# Allegro board mib_tongue2_m12.brd
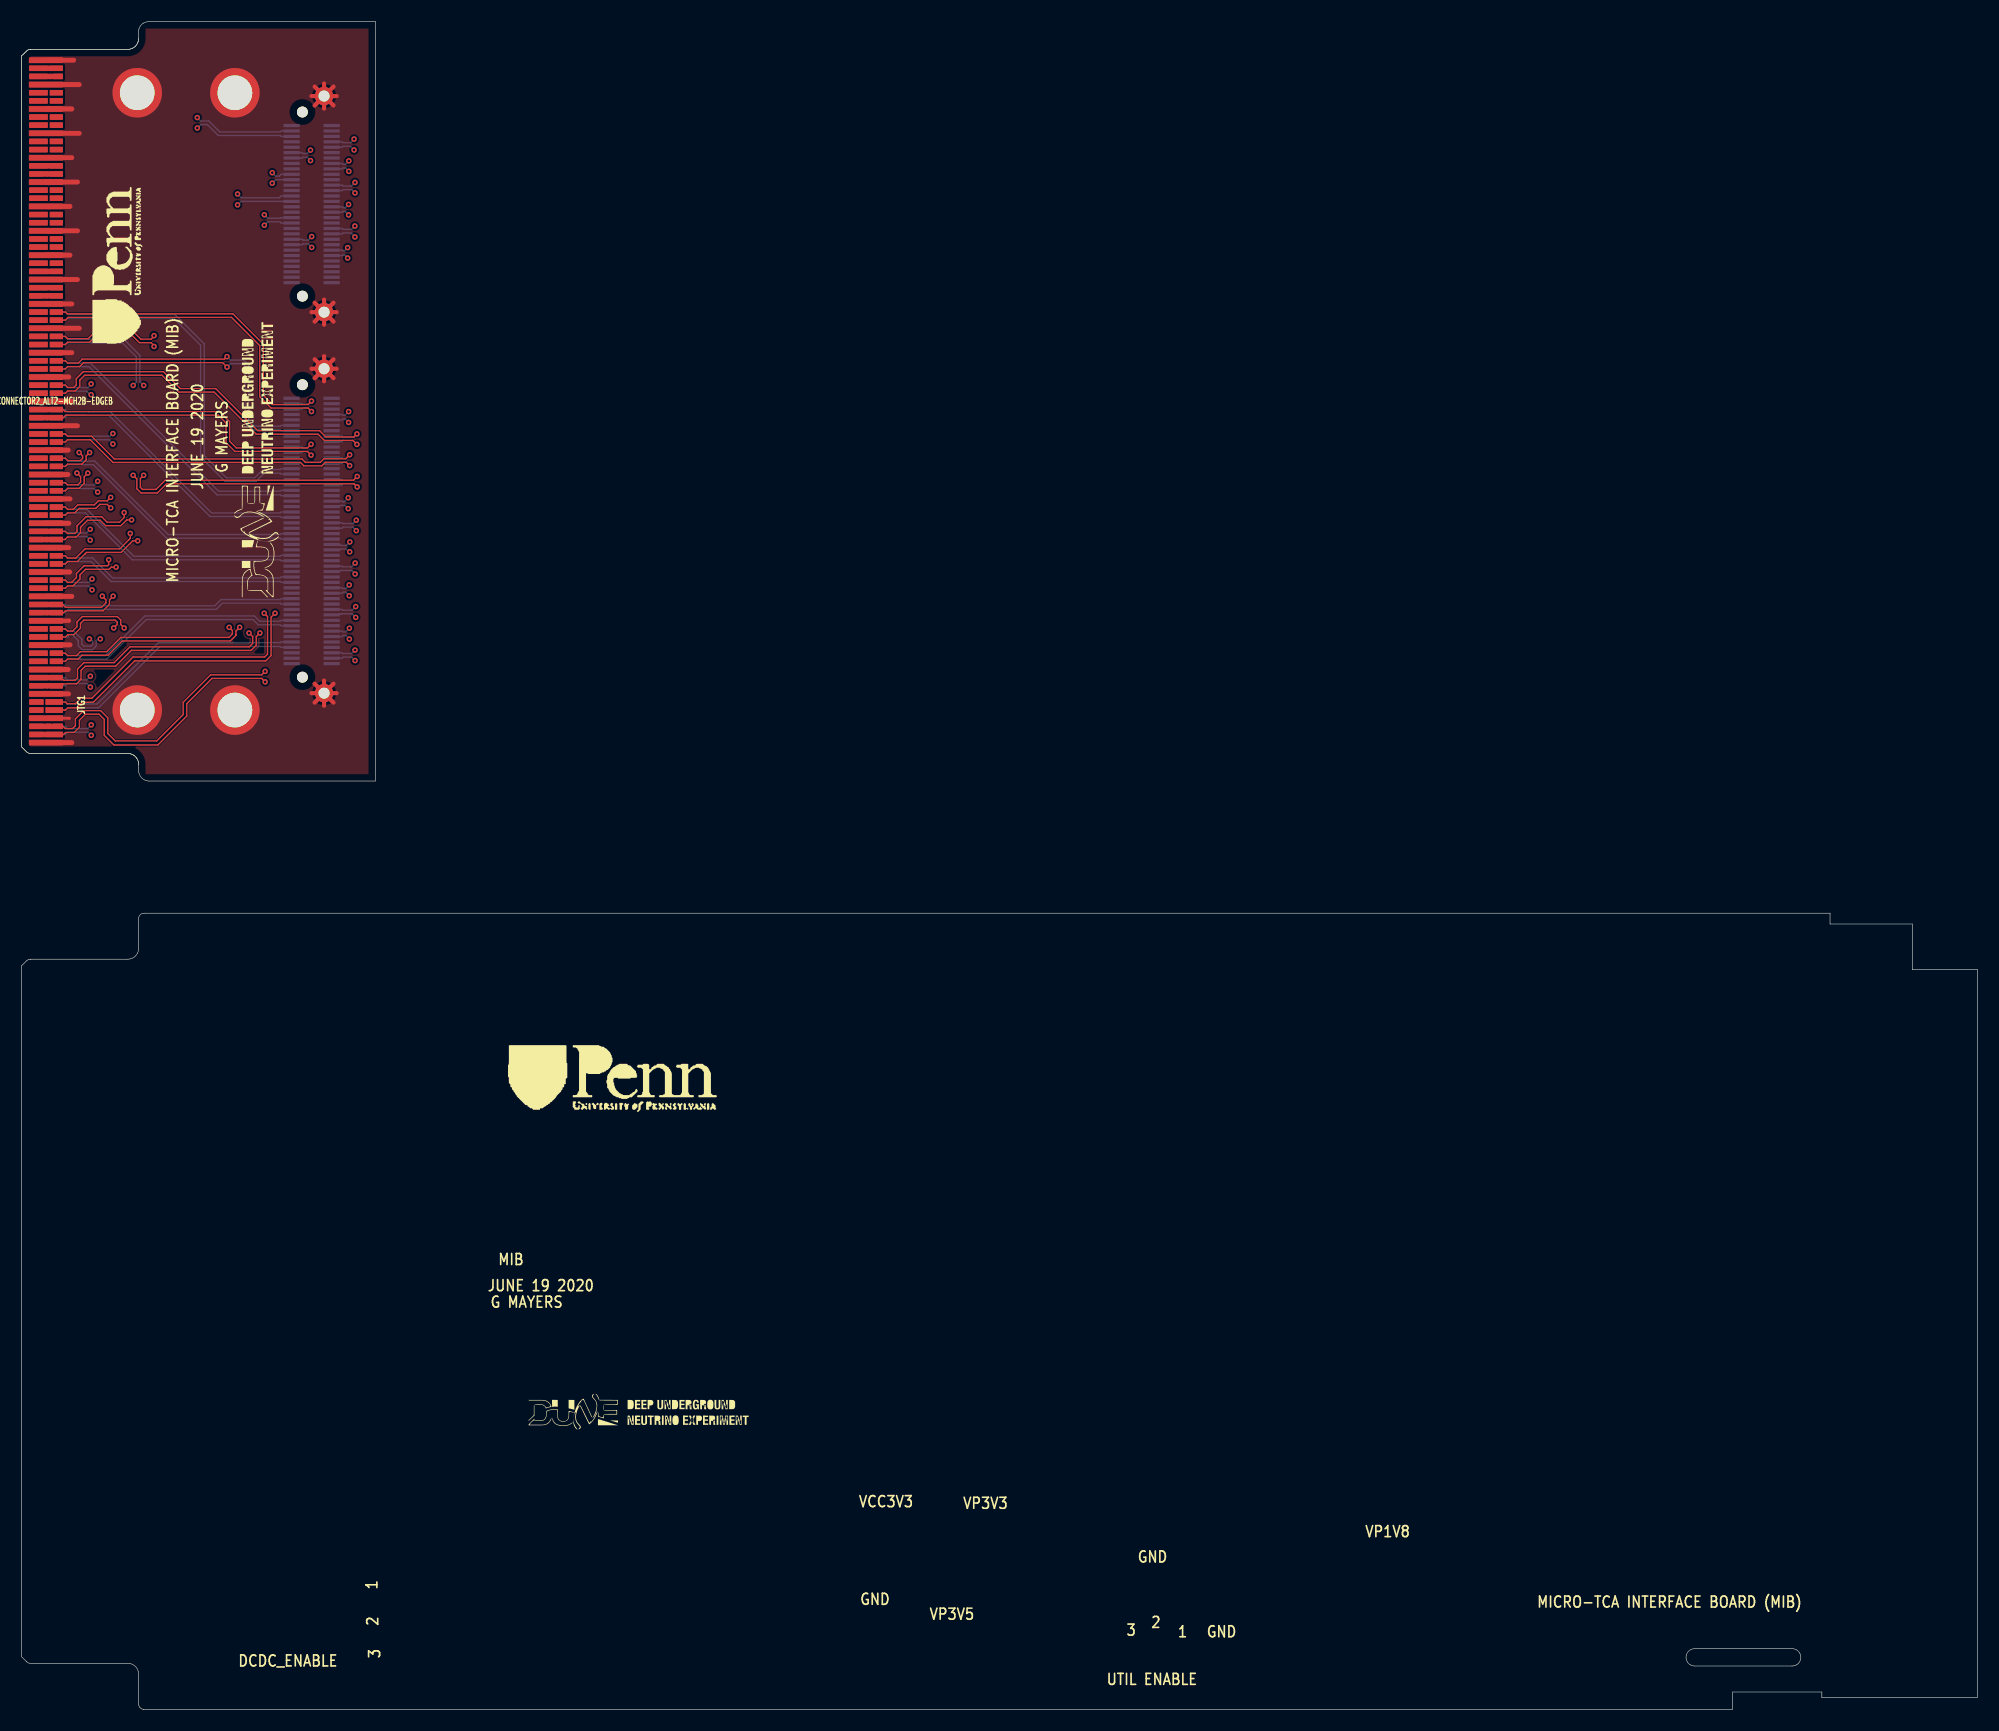
[diagram p0: board, top side]
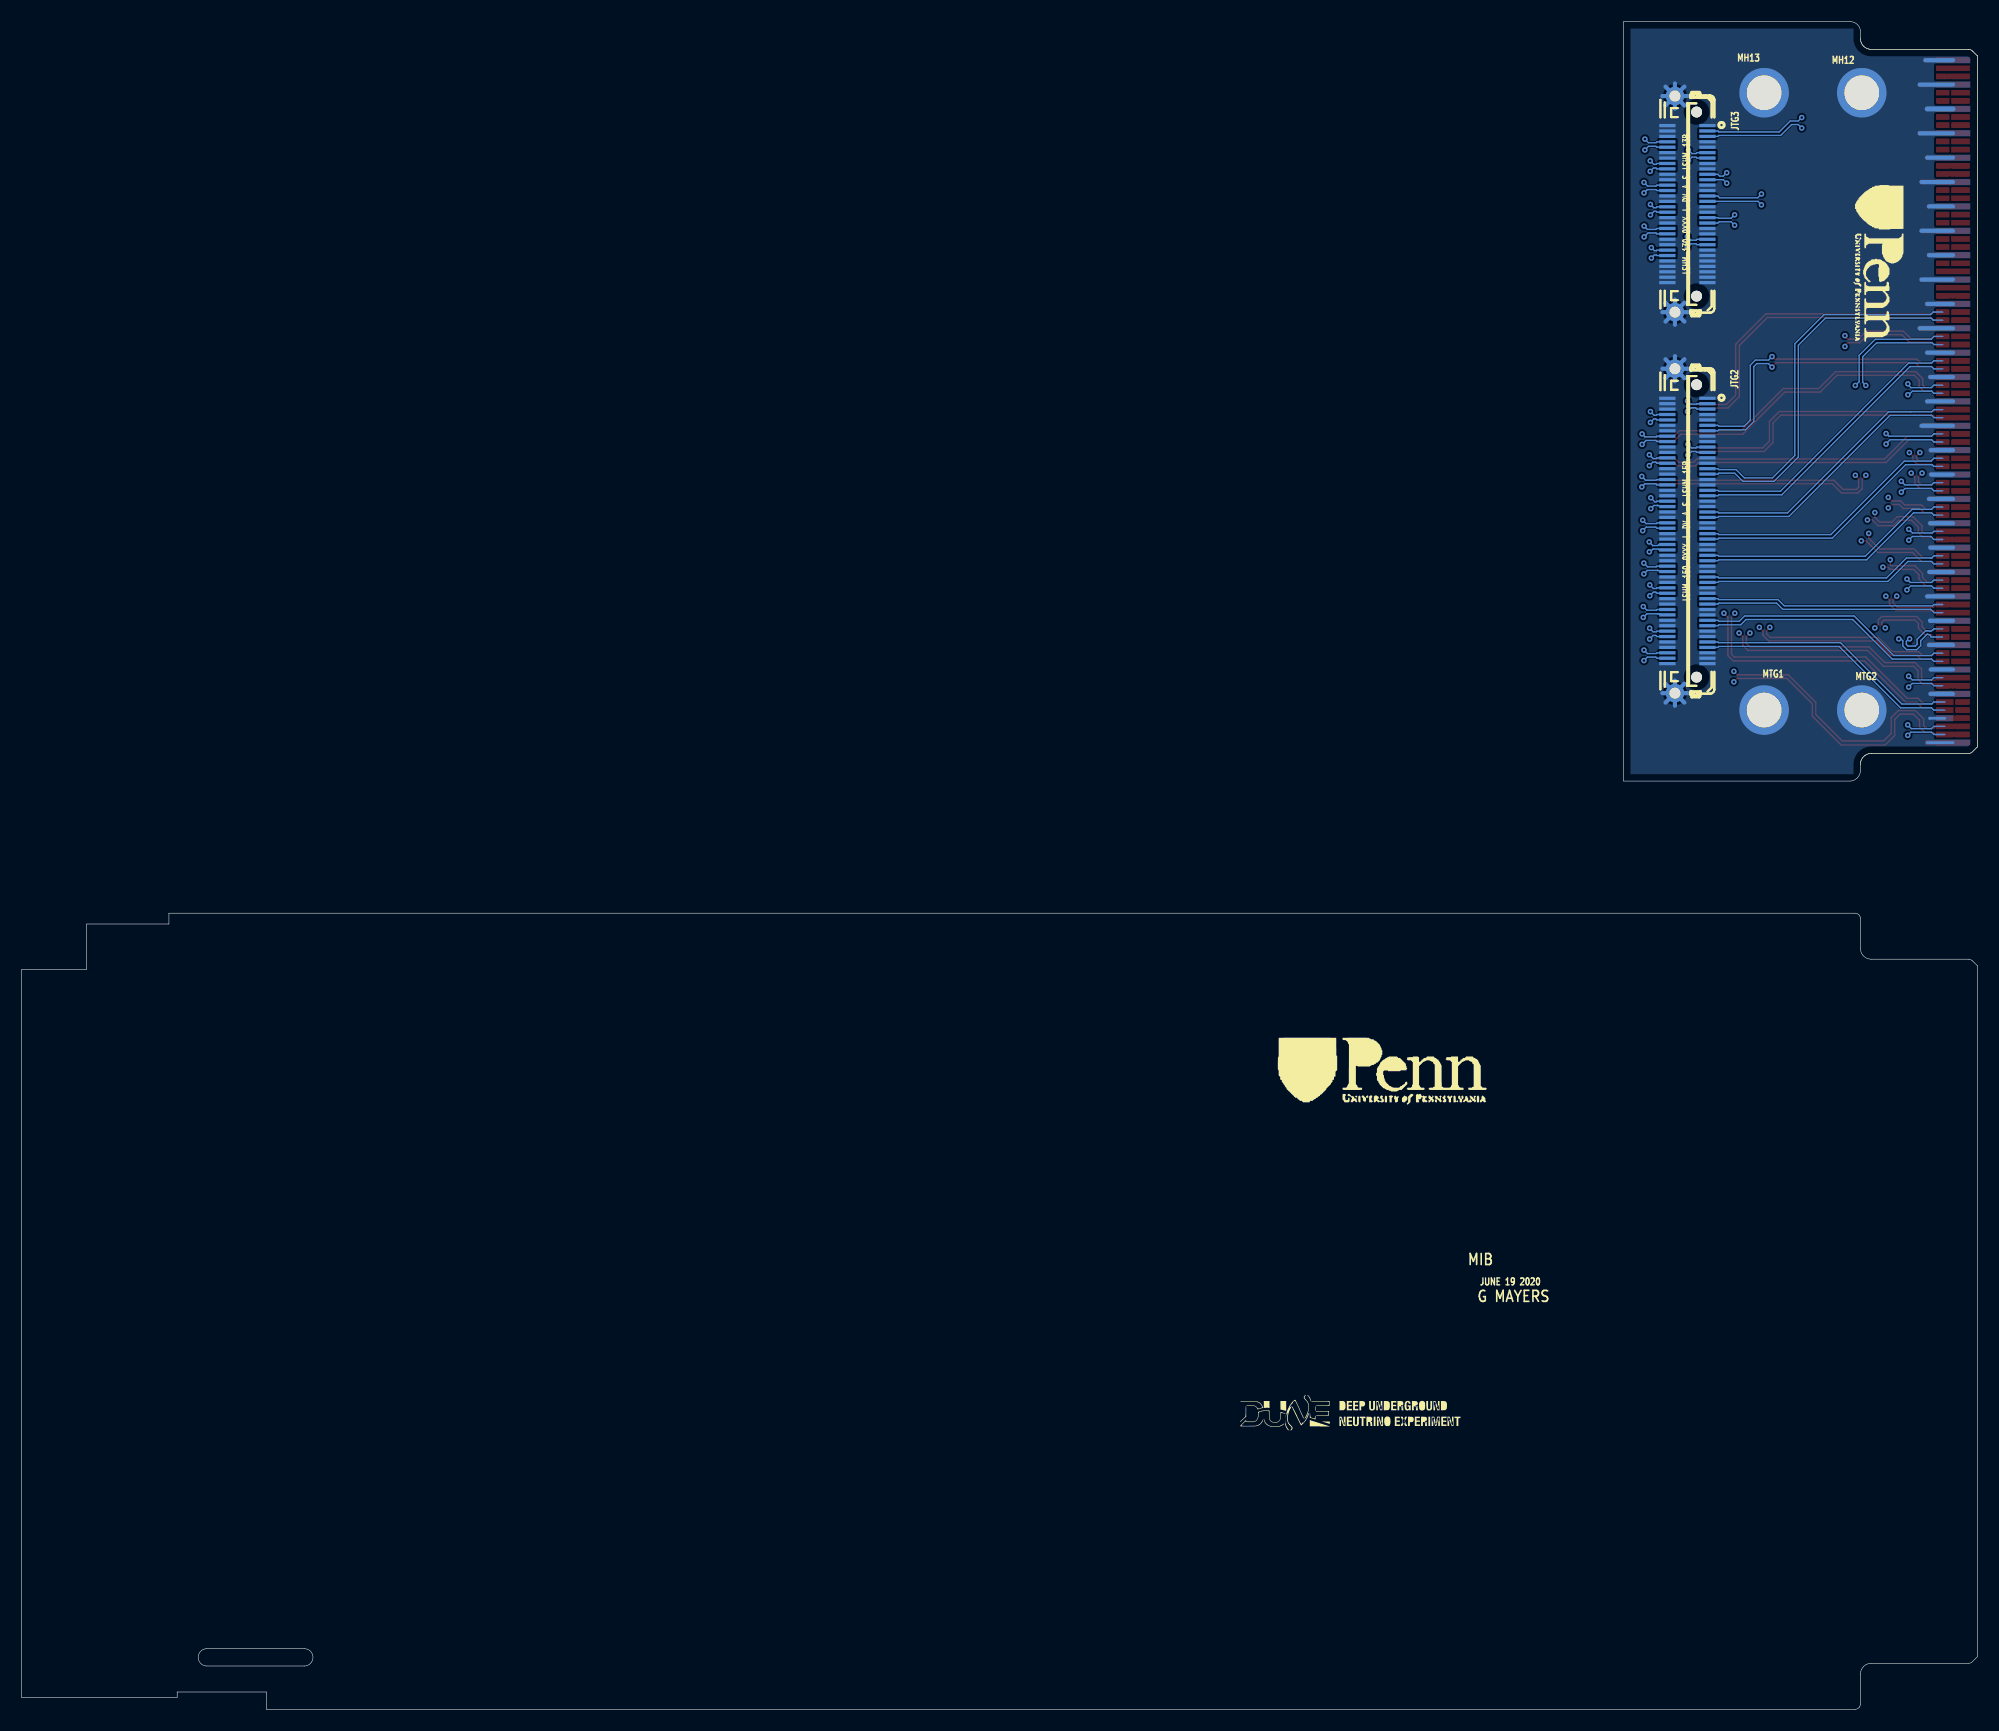
[diagram p1: board, bottom side, seen from below]

Outline 180.6 x 155.81 mm; copper layers: TOP, 02_GND, 03_SIG1, 04_GND, 05_PWR1, 06_GND, 07_SIG2, 08_GND, 09_SIG3, BOTTOM. Coordinates in mm from the lower left corner of the outline.
Outline path: 0,152.65 0.46,153.1 arc(0.62,153.21) 0.8,153.25 0.83,153.25 9.8,153.25 arc(10.51,153.54) 10.8,154.25 10.8,154.99 arc(11.11,155.57) 11.73,155.81 32.67,155.81 32.67,85.7 11.72,85.7 arc(11.06,86.01) 10.8,86.68 10.8,87.25 arc(10.5,87.96) 9.8,88.25 0.8,88.25 arc(0.62,88.28) 0.46,88.39 0,88.85 0,152.65 ; 0,68.65 0.46,69.11 arc(0.62,69.21) 0.8,69.25 0.83,69.25 9.8,69.25 arc(10.51,69.54) 10.8,70.25 10.8,73.01 arc(10.95,73.36) 11.3,73.5 167,73.5 167,72.5 174.6,72.5 174.6,68.3 180.6,68.3 180.6,1.1 166.24,1.1 166.24,1.6 158,1.6 158,0 11.27,0 arc(11.06,0.06) 10.89,0.21 arc(10.82,0.34) 10.8,0.49 10.8,3.26 arc(10.5,3.96) 9.8,4.25 0.8,4.25 arc(0.62,4.29) 0.46,4.39 0,4.85 0,68.65 ; 154.5,4 arc(153.7,4.8) 154.5,5.6 163.5,5.6 arc(164.3,4.8) 163.5,4 154.5,4

## Design rules (mm)
constraint set DEFAULT: min track width 0.127
net group BP.DATA_IN_N: nets BP.DATA_IN_N<0> BP.DATA_IN_N<1> BP.DATA_IN_N<2> BP.DATA_IN_N<3> BP.DATA_IN_N<4> BP.DATA_IN_N<5> BP.DATA_IN_N<6> BP.DATA_IN_N<7> BP.DATA_IN_N<8> BP.DATA_IN_N<9> BP.DATA_IN_N<10> BP.DATA_IN_N<11>
net group BP.DATA_IN_P: nets BP.DATA_IN_P<0> BP.DATA_IN_P<1> BP.DATA_IN_P<2> BP.DATA_IN_P<3> BP.DATA_IN_P<4> BP.DATA_IN_P<5> BP.DATA_IN_P<6> BP.DATA_IN_P<7> BP.DATA_IN_P<8> BP.DATA_IN_P<9> BP.DATA_IN_P<10> BP.DATA_IN_P<11>
net group BP.DATA_OUT_N: nets BP.DATA_OUT_N<0> BP.DATA_OUT_N<1> BP.DATA_OUT_N<2> BP.DATA_OUT_N<3> BP.DATA_OUT_N<4> BP.DATA_OUT_N<5> BP.DATA_OUT_N<6> BP.DATA_OUT_N<7> BP.DATA_OUT_N<8> BP.DATA_OUT_N<9> BP.DATA_OUT_N<10> BP.DATA_OUT_N<11>
net group BP.DATA_OUT_P: nets BP.DATA_OUT_P<0> BP.DATA_OUT_P<1> BP.DATA_OUT_P<2> BP.DATA_OUT_P<3> BP.DATA_OUT_P<4> BP.DATA_OUT_P<5> BP.DATA_OUT_P<6> BP.DATA_OUT_P<7> BP.DATA_OUT_P<8> BP.DATA_OUT_P<9> BP.DATA_OUT_P<10> BP.DATA_OUT_P<11>
net group BP.REF_CLK_N: nets BP.REF_CLK_N<0> BP.REF_CLK_N<1> BP.REF_CLK_N<2> BP.REF_CLK_N<3> BP.REF_CLK_N<4> BP.REF_CLK_N<5> BP.REF_CLK_N<6> BP.REF_CLK_N<7> BP.REF_CLK_N<8> BP.REF_CLK_N<9> BP.REF_CLK_N<10> BP.REF_CLK_N<11>
net group BP.REF_CLK_P: nets BP.REF_CLK_P<0> BP.REF_CLK_P<1> BP.REF_CLK_P<2> BP.REF_CLK_P<3> BP.REF_CLK_P<4> BP.REF_CLK_P<5> BP.REF_CLK_P<6> BP.REF_CLK_P<7> BP.REF_CLK_P<8> BP.REF_CLK_P<9> BP.REF_CLK_P<10> BP.REF_CLK_P<11>

## Placement (name value [footprint] x y rotation side)
JTG1  MCH_TG2-EDGE-170_ALT2  [AMC0_R2_BPLUS_PCB_EDGE]  2.25 120.75 0 top
JTG2  LSHM-150-03.0-L-DV-A-S-K-TR  [SAMTEC_LSHM-150-04-0-L-DV-A-S]  26.83 108.79 90 bottom
JTG3  LSHM-130-03.0-L-DV-A-S-K-TR  [SAMTEC_LSHM-130-04-0-L-DV-A-S]  26.83 138.96 90 bottom
MTG1  MT_HOLE  [MOUNTHOLE]  19.69 92.25 180 bottom
MTG2  MT_HOLE  [MOUNTHOLE]  10.67 92.25 180 bottom
MTG3  MT_HOLE  [MOUNTHOLE]  19.69 149.24 180 bottom
MTG4  MT_HOLE  [MOUNTHOLE]  10.67 149.24 180 bottom
NOREF  -  []  12.04 125.75 90 top
NOREF#2  -  []  0.77 153.25 0 top
NOREF#3  -  []  32.67 85.7 90 top
NOREF#4  -  []  153.74 4.81 0 top
NOREF#5  -  []  161.05 4 90 top
NOREF#6  -  []  0 64.12 0 top
NOREF#7  -  []  157.38 0 90 top
NOREF#8  -  []  5.36 4.25 90 top
NOREF#9  -  []  0.92 4.25 90 top
NOREF#10  -  []  -27.5 124.03 0 top
NOREF#11  -  []  -27.5 136.85 0 top
NOREF#12  -  []  10.8 72.31 0 top
NOREF#13  -  []  23.75 102.67 90 top
NOREF#14  -  []  178.32 68.3 90 top
NOREF#15  -  []  -255.82 -99.62 0 top
NOREF#16  -  []  0 152.61 0 top
NOREF#17  -  []  46.82 25.83 0 top
NOREF#18  -  []  0 39.45 0 top
NOREF#19  -  []  44.48 53.98 0 top
NOREF#20  -  []  -26.64 123.32 0 top
NOREF#21  -  []  15.11 0 90 top
NOREF#22  -  []  153.92 4.25 0 top
NOREF#23  -  []  0.8 88.25 90 top
NOREF#24  -  []  167 73.04 0 top
NOREF#25  -  []  158 0.73 0 top
NOREF#26  -  []  12.32 141.05 270 bottom
NOREF#27  -  []  65.03 54.66 180 bottom
NOREF#28  -  []  68.05 25.73 180 bottom

## Library data of the parts
JTG1 = MCH_CONNECTOR2_ALT2: part number: MCH_CONNECTOR2_ALT2-MCH2B-EDGE-170,MCH_CONNECTOR2_ALT2
JTG2 = LSHM-150-0XXX-L-DV-A-S: part number: LSHM-150-0XXX-L-DV-A-S-LSHM-150-03.0-L-DV-A-S-K-TR,LSHM-150-0XXX-L-DV-A-S
JTG3 = LSHM-130-0XXX-L-DV-A-S: part number: LSHM-130-0XXX-L-DV-A-S-LSHM-130-03.0-L-DV-A-S-K-TR,LSHM-130-0XXX-L-DV-A-S
MTG1-MTG4 = MT_HOLE: part number: MT_HOLE-MT_HOLE,MT_HOLE

## Footprints (pads in the part's own frame, mm; a bottom-side part is the same pattern mirrored in y, then rotated)
AMC0_R2_BPLUS_PCB_EDGE
  rect 1.3x0.5 smd: (-0.888,21) (-0.888,9.75) (-0.888,-1.5) (-0.888,-12.75) (-0.888,-19.5) (-0.888,-26.25) (-0.888,-27.75) (-0.888,-27.75) (-0.888,-28.5) (-0.888,-28.5) (-0.888,-29.25) (-0.888,-30) (-0.888,-30.75)
  rect 1.7x0.5 smd: (-0.7,30.75) (-0.7,30) (-0.7,28.5) (-0.7,28.5) (-0.7,27.75) (-0.7,27.75) (-0.7,26.25) (-0.7,26.25) (-0.7,25.5) (-0.7,25.5) (-0.7,24) (-0.7,24) (-0.7,23.25) (-0.7,23.25) (-0.7,21.75) (-0.7,21) (-0.7,19.5) (-0.7,19.5) (-0.7,18.75) (-0.7,18.75) (-0.7,17.25) (-0.7,17.25) (-0.7,16.5) (-0.7,16.5) (-0.7,15) (-0.7,15) (-0.7,14.25) (-0.7,14.25) (-0.7,12.75) (-0.7,12.75) (-0.7,12) (-0.7,10.5) (-0.7,9.75) (-0.7,8.25) (-0.7,8.25) (-0.7,7.5) (-0.7,7.5) (-0.7,6) (-0.7,6) (-0.7,5.25) (-0.7,5.25) (-0.7,3.75) (-0.7,3.75) (-0.7,3) (-0.7,3) (-0.7,1.5) (-0.7,1.5) (-0.7,0.75) (-0.7,0.75) (-0.7,-0.75) (-0.7,-1.5) (-0.7,-3) (-0.7,-3) (-0.7,-3.75) (-0.7,-3.75) (-0.7,-5.25) (-0.7,-5.25) (-0.7,-6) (-0.7,-6) (-0.7,-7.5) (-0.7,-7.5) (-0.7,-8.25) (-0.7,-8.25) (-0.7,-9.75) (-0.7,-9.75) (-0.7,-10.5) (-0.7,-10.5) (-0.7,-12) (-0.7,-12.75) (-0.7,-14.25) (-0.7,-14.25) (-0.7,-15) (-0.7,-15) (-0.7,-16.5) (-0.7,-16.5) (-0.7,-17.25) (-0.7,-17.25) (-0.7,-18.75) (-0.7,-19.5) (-0.7,-21) (-0.7,-21) (-0.7,-21.75) (-0.7,-21.75) (-0.7,-23.25) (-0.7,-23.25) (-0.7,-24) (-0.7,-24) (-0.7,-25.5) (-0.7,-26.25)
  rect 2x0.5 smd: (-0.55,30) (-0.55,-30)
  rect 3.1x0.5 smd: 1(0,-31.5) 2(0,-30.75) 4(0,-29.25) 7(0,-27) 9(0,-25.5) 10(0,-24.75) 13(0,-22.5) 16(0,-20.25) 18(0,-18.75) 19(0,-18) 22(0,-15.75) 25(0,-13.5) 27(0,-12) 28(0,-11.25) 31(0,-9) 34(0,-6.75) 37(0,-4.5) 40(0,-2.25) 42(0,-0.75) 43(0,0) 46(0,2.25) 49(0,4.5) 52(0,6.75) 55(0,9) 57(0,10.5) 58(0,11.25) 61(0,13.5) 64(0,15.75) 67(0,18) 70(0,20.25) 72(0,21.75) 73(0,22.5) 76(0,24.75) 79(0,27) 82(0,29.25) 84(0,30.75) 85(0,31.5) 86(0,31.5) 89(0,29.25) 92(0,27) 95(0,24.75) 98(0,22.5) 101(0,20.25) 104(0,18) 107(0,15.75) 110(0,13.5) 112(0,12) 113(0,11.25) 116(0,9) 119(0,6.75) 122(0,4.5) 125(0,2.25) 128(0,0) 131(0,-2.25) 134(0,-4.5) 137(0,-6.75) 140(0,-9) 143(0,-11.25) 146(0,-13.5) 149(0,-15.75) 152(0,-18) 155(0,-20.25) 158(0,-22.5) 161(0,-24.75) 164(0,-27) 170(0,-31.5)
  rect 0.9x0.5 smd: 3(1.1,-30) 83(1.1,30)
  rect 1.6x0.5 smd: 5(0.762,-28.5) 6(0.762,-27.75) 8(0.762,-26.25) 17(0.762,-19.5) 26(0.762,-12.75) 41(0.762,-1.5) 56(0.762,9.75) 71(0.762,21) 165(0.762,-27.75) 166(0.762,-28.5) 167(0.762,-29.25) 168(0.762,-30) 169(0.762,-30.75)
  rect 1.2x0.5 smd: 11(0.95,-24) 12(0.95,-23.25) 14(0.95,-21.75) 15(0.95,-21) 20(0.95,-17.25) 21(0.95,-16.5) 23(0.95,-15) 24(0.95,-14.25) 29(0.95,-10.5) 30(0.95,-9.75) 32(0.95,-8.25) 33(0.95,-7.5) 35(0.95,-6) 36(0.95,-5.25) 38(0.95,-3.75) 39(0.95,-3) 44(0.95,0.75) 45(0.95,1.5) 47(0.95,3) 48(0.95,3.75) 50(0.95,5.25) 51(0.95,6) 53(0.95,7.5) 54(0.95,8.25) 59(0.95,12) 60(0.95,12.75) 62(0.95,14.25) 63(0.95,15) 65(0.95,16.5) 66(0.95,17.25) 68(0.95,18.75) 69(0.95,19.5) 74(0.95,23.25) 75(0.95,24) 77(0.95,25.5) 78(0.95,26.25) 80(0.95,27.75) 81(0.95,28.5) 87(0.95,30.75) 88(0.95,30) 90(0.95,28.5) 91(0.95,27.75) 93(0.95,26.25) 94(0.95,25.5) 96(0.95,24) 97(0.95,23.25) 99(0.95,21.75) 100(0.95,21) 102(0.95,19.5) 103(0.95,18.75) 105(0.95,17.25) 106(0.95,16.5) 108(0.95,15) 109(0.95,14.25) 111(0.95,12.75) 114(0.95,10.5) 115(0.95,9.75) 117(0.95,8.25) 118(0.95,7.5) 120(0.95,6) 121(0.95,5.25) 123(0.95,3.75) 124(0.95,3) 126(0.95,1.5) 127(0.95,0.75) 129(0.95,-0.75) 130(0.95,-1.5) 132(0.95,-3) 133(0.95,-3.75) 135(0.95,-5.25) 136(0.95,-6) 138(0.95,-7.5) 139(0.95,-8.25) 141(0.95,-9.75) 142(0.95,-10.5) 144(0.95,-12) 145(0.95,-12.75) 147(0.95,-14.25) 148(0.95,-15) 150(0.95,-16.5) 151(0.95,-17.25) 153(0.95,-18.75) 154(0.95,-19.5) 156(0.95,-21) 157(0.95,-21.75) 159(0.95,-23.25) 160(0.95,-24) 162(0.95,-25.5) 163(0.95,-26.25)
MOUNTHOLE
  round 4.572 hole 3.2: 1(0,0)
SAMTEC_LSHM-130-04-0-L-DV-A-S
  round 1 hole 1.45 unplated: (-8.5,-0.9) (8.5,-0.9)
  rect 0.3x1.5 smd: 1(7.25,-1.9) 2(7.25,1.8) 3(6.75,-1.9) 4(6.75,1.8) 5(6.25,-1.9) 6(6.25,1.8) 7(5.75,-1.9) 8(5.75,1.8) 9(5.25,-1.9) 10(5.25,1.8) 11(4.75,-1.9) 12(4.75,1.8) 13(4.25,-1.9) 14(4.25,1.8) 15(3.75,-1.9) 16(3.75,1.8) 17(3.25,-1.9) 18(3.25,1.8) 19(2.75,-1.9) 20(2.75,1.8) 21(2.25,-1.9) 22(2.25,1.8) 23(1.75,-1.9) 24(1.75,1.8) 25(1.25,-1.9) 26(1.25,1.8) 27(0.75,-1.9) 28(0.75,1.8) 29(0.25,-1.9) 30(0.25,1.8) 31(-0.25,-1.9) 32(-0.25,1.8) 33(-0.75,-1.9) 34(-0.75,1.8) 35(-1.25,-1.9) 36(-1.25,1.8) 37(-1.75,-1.9) 38(-1.75,1.8) 39(-2.25,-1.9) 40(-2.25,1.8) 41(-2.75,-1.9) 42(-2.75,1.8) 43(-3.25,-1.9) 44(-3.25,1.8) 45(-3.75,-1.9) 46(-3.75,1.8) 47(-4.25,-1.9) 48(-4.25,1.8) 49(-4.75,-1.9) 50(-4.75,1.8) 51(-5.25,-1.9) 52(-5.25,1.8) 53(-5.75,-1.9) 54(-5.75,1.8) 55(-6.25,-1.9) 56(-6.25,1.8) 57(-6.75,-1.9) 58(-6.75,1.8) 59(-7.25,-1.9) 60(-7.25,1.8)
  round 1.702 hole 1.016: 61(-9.975,1.1) 62(9.975,1.1)
SAMTEC_LSHM-150-04-0-L-DV-A-S
  round 1 hole 1.45 unplated: (-13.5,-0.9) (13.5,-0.9)
  rect 0.3x1.5 smd: 1(12.25,-1.9) 2(12.25,1.8) 3(11.75,-1.9) 4(11.75,1.8) 5(11.25,-1.9) 6(11.25,1.8) 7(10.75,-1.9) 8(10.75,1.8) 9(10.25,-1.9) 10(10.25,1.8) 11(9.75,-1.9) 12(9.75,1.8) 13(9.25,-1.9) 14(9.25,1.8) 15(8.75,-1.9) 16(8.75,1.8) 17(8.25,-1.9) 18(8.25,1.8) 19(7.75,-1.9) 20(7.75,1.8) 21(7.25,-1.9) 22(7.25,1.8) 23(6.75,-1.9) 24(6.75,1.8) 25(6.25,-1.9) 26(6.25,1.8) 27(5.75,-1.9) 28(5.75,1.8) 29(5.25,-1.9) 30(5.25,1.8) 31(4.75,-1.9) 32(4.75,1.8) 33(4.25,-1.9) 34(4.25,1.8) 35(3.75,-1.9) 36(3.75,1.8) 37(3.25,-1.9) 38(3.25,1.8) 39(2.75,-1.9) 40(2.75,1.8) 41(2.25,-1.9) 42(2.25,1.8) 43(1.75,-1.9) 44(1.75,1.8) 45(1.25,-1.9) 46(1.25,1.8) 47(0.75,-1.9) 48(0.75,1.8) 49(0.25,-1.9) 50(0.25,1.8) 51(-0.25,-1.9) 52(-0.25,1.8) 53(-0.75,-1.9) 54(-0.75,1.8) 55(-1.25,-1.9) 56(-1.25,1.8) 57(-1.75,-1.9) 58(-1.75,1.8) 59(-2.25,-1.9) 60(-2.25,1.8) 61(-2.75,-1.9) 62(-2.75,1.8) 63(-3.25,-1.9) 64(-3.25,1.8) 65(-3.75,-1.9) 66(-3.75,1.8) 67(-4.25,-1.9) 68(-4.25,1.8) 69(-4.75,-1.9) 70(-4.75,1.8) 71(-5.25,-1.9) 72(-5.25,1.8) 73(-5.75,-1.9) 74(-5.75,1.8) 75(-6.25,-1.9) 76(-6.25,1.8) 77(-6.75,-1.9) 78(-6.75,1.8) 79(-7.25,-1.9) 80(-7.25,1.8) 81(-7.75,-1.9) 82(-7.75,1.8) 83(-8.25,-1.9) 84(-8.25,1.8) 85(-8.75,-1.9) 86(-8.75,1.8) 87(-9.25,-1.9) 88(-9.25,1.8) 89(-9.75,-1.9) 90(-9.75,1.8) 91(-10.25,-1.9) 92(-10.25,1.8) 93(-10.75,-1.9) 94(-10.75,1.8) 95(-11.25,-1.9) 96(-11.25,1.8) 97(-11.75,-1.9) 98(-11.75,1.8) 99(-12.25,-1.9) 100(-12.25,1.8)
  round 1.702 hole 1.016: 101(-14.975,1.1) 102(14.975,1.1)

## Nets
GND: JTG1.1 JTG1.4 JTG1.7 JTG1.10 JTG1.13 JTG1.16 JTG1.19 JTG1.22 JTG1.25 JTG1.28 JTG1.31 JTG1.34 JTG1.37 JTG1.40 JTG1.43 JTG1.46 JTG1.49 JTG1.52 JTG1.55 JTG1.58 JTG1.61 JTG1.64 JTG1.67 JTG1.70 JTG1.73 JTG1.76 JTG1.79 JTG1.82 JTG1.85 JTG1.86 JTG1.89 JTG1.92 JTG1.95 JTG1.98 JTG1.101 JTG1.104 JTG1.107 JTG1.110 JTG1.113 JTG1.116 JTG1.119 JTG1.122 JTG1.125 JTG1.128 JTG1.131 JTG1.134 JTG1.137 JTG1.140 JTG1.143 JTG1.146 JTG1.149 JTG1.152 JTG1.155 JTG1.158 JTG1.161 JTG1.164 JTG1.167 JTG1.170 JTG2.1 JTG2.2 JTG2.4 JTG2.6 JTG2.7 JTG2.9 JTG2.12 JTG2.14 JTG2.15 JTG2.17 JTG2.20 JTG2.22 JTG2.23 JTG2.25 JTG2.28 JTG2.30 JTG2.31 JTG2.33 JTG2.36 JTG2.38 JTG2.39 JTG2.41 JTG2.44 JTG2.46 JTG2.47 JTG2.49 JTG2.52 JTG2.54 JTG2.55 JTG2.57 JTG2.60 JTG2.62 JTG2.63 JTG2.65 JTG2.68 JTG2.70 JTG2.71 JTG2.73 JTG2.76 JTG2.78 JTG2.79 JTG2.81 JTG2.84 JTG2.86 JTG2.87 JTG2.89 JTG2.92 JTG2.94 JTG2.95 JTG2.97 JTG2.99 JTG2.100 JTG2.101 JTG2.102(F2) JTG3.1 JTG3.2 JTG3.4 JTG3.6 JTG3.7 JTG3.9 JTG3.12 JTG3.14 JTG3.15 JTG3.17 JTG3.20 JTG3.22 JTG3.23 JTG3.25 JTG3.28 JTG3.30 JTG3.31 JTG3.33 JTG3.36 JTG3.38 JTG3.39 JTG3.41 JTG3.44 JTG3.46 JTG3.47 JTG3.49 JTG3.51 JTG3.52 JTG3.53 JTG3.54 JTG3.55 JTG3.56 JTG3.57 JTG3.58 JTG3.59 JTG3.60 JTG3.61 JTG3.62(F2) MTG1.1(MH_SIG) MTG2.1(MH_SIG) MTG3.1(MH_SIG) MTG4.1(MH_SIG)
BP.DATA_IN_N<0>: JTG1.53 JTG2.5
BP.DATA_IN_N<1>: JTG1.50 JTG2.10
BP.DATA_IN_N<2>: JTG1.47 JTG2.13
BP.DATA_IN_N<3>: JTG1.44 JTG2.18
BP.DATA_IN_N<4>: JTG1.41 JTG2.21
BP.DATA_IN_N<5>: JTG1.38 JTG2.26
BP.DATA_IN_N<6>: JTG1.118 JTG2.29
BP.DATA_IN_N<7>: JTG1.121 JTG2.34
BP.DATA_IN_N<8>: JTG1.124 JTG2.37
BP.DATA_IN_N<9>: JTG1.127 JTG2.42
BP.DATA_IN_N<10>: JTG1.130 JTG2.45
BP.DATA_IN_N<11>: JTG1.133 JTG2.50
BP.DATA_IN_P<0>: JTG1.54 JTG2.3
BP.DATA_IN_P<1>: JTG1.51 JTG2.8
BP.DATA_IN_P<2>: JTG1.48 JTG2.11
BP.DATA_IN_P<3>: JTG1.45 JTG2.16
BP.DATA_IN_P<4>: JTG1.42 JTG2.19
BP.DATA_IN_P<5>: JTG1.39 JTG2.24
BP.DATA_IN_P<6>: JTG1.117 JTG2.27
BP.DATA_IN_P<7>: JTG1.120 JTG2.32
BP.DATA_IN_P<8>: JTG1.123 JTG2.35
BP.DATA_IN_P<9>: JTG1.126 JTG2.40
BP.DATA_IN_P<10>: JTG1.129 JTG2.43
BP.DATA_IN_P<11>: JTG1.132 JTG2.48
BP.DATA_OUT_N<0>: JTG1.136 JTG2.53
BP.DATA_OUT_N<1>: JTG1.139 JTG2.58
BP.DATA_OUT_N<2>: JTG1.142 JTG2.61
BP.DATA_OUT_N<3>: JTG1.145 JTG2.66
BP.DATA_OUT_N<4>: JTG1.148 JTG2.69
BP.DATA_OUT_N<5>: JTG1.151 JTG2.74
BP.DATA_OUT_N<6>: JTG1.154 JTG2.77
BP.DATA_OUT_N<7>: JTG1.157 JTG2.82
BP.DATA_OUT_N<8>: JTG1.160 JTG2.85
BP.DATA_OUT_N<9>: JTG1.163 JTG2.90
BP.DATA_OUT_N<10>: JTG1.166 JTG2.93
BP.DATA_OUT_N<11>: JTG1.169 JTG2.98
BP.DATA_OUT_P<0>: JTG1.135 JTG2.51
BP.DATA_OUT_P<1>: JTG1.138 JTG2.56
BP.DATA_OUT_P<2>: JTG1.141 JTG2.59
BP.DATA_OUT_P<3>: JTG1.144 JTG2.64
BP.DATA_OUT_P<4>: JTG1.147 JTG2.67
BP.DATA_OUT_P<5>: JTG1.150 JTG2.72
BP.DATA_OUT_P<6>: JTG1.153 JTG2.75
BP.DATA_OUT_P<7>: JTG1.156 JTG2.80
BP.DATA_OUT_P<8>: JTG1.159 JTG2.83
BP.DATA_OUT_P<9>: JTG1.162 JTG2.88
BP.DATA_OUT_P<10>: JTG1.165 JTG2.91
BP.DATA_OUT_P<11>: JTG1.168 JTG2.96
BP.REF_CLK_N<0>: JTG1.35 JTG3.5
BP.REF_CLK_N<1>: JTG1.32 JTG3.10
BP.REF_CLK_N<2>: JTG1.29 JTG3.13
BP.REF_CLK_N<3>: JTG1.26 JTG3.18
BP.REF_CLK_N<4>: JTG1.23 JTG3.21
BP.REF_CLK_N<5>: JTG1.20 JTG3.26
BP.REF_CLK_N<6>: JTG1.17 JTG3.29
BP.REF_CLK_N<7>: JTG1.14 JTG3.34
BP.REF_CLK_N<8>: JTG1.11 JTG3.37
BP.REF_CLK_N<9>: JTG1.8 JTG3.42
BP.REF_CLK_N<10>: JTG1.5 JTG3.45
BP.REF_CLK_N<11>: JTG1.2 JTG3.50
BP.REF_CLK_P<0>: JTG1.36 JTG3.3
BP.REF_CLK_P<1>: JTG1.33 JTG3.8
BP.REF_CLK_P<2>: JTG1.30 JTG3.11
BP.REF_CLK_P<3>: JTG1.27 JTG3.16
BP.REF_CLK_P<4>: JTG1.24 JTG3.19
BP.REF_CLK_P<5>: JTG1.21 JTG3.24
BP.REF_CLK_P<6>: JTG1.18 JTG3.27
BP.REF_CLK_P<7>: JTG1.15 JTG3.32
BP.REF_CLK_P<8>: JTG1.12 JTG3.35
BP.REF_CLK_P<9>: JTG1.9(TXFUB-) JTG3.40
BP.REF_CLK_P<10>: JTG1.6 JTG3.43
BP.REF_CLK_P<11>: JTG1.3 JTG3.48

Pads without a net: JTG1 56 57 59 60 62 63 65 66 68 69 71 72 74 75 77 78 80 81 83 84 87 88 90 91 93 94 96 97 99 100 102 103 105 106 108 109 111 112 114 115

## Via types
v1: diameter 0.508, hole 0.254, TOP to BOTTOM, 100 vias

## Routing (per net, layer and track width the routed paths; a pad name or vN(x,y) marks a point on that pad's centre or on a via; arc(x,y) is an arc through that point)
GND: length 443.9
  TOP w0.254: 4.4,91.48 4.38,91.5 JTG1.4
  TOP w0.381: 27.06,94.68 JTG2.101 ; JTG2.101 27.93,94.97 ; JTG2.101 28.79,94.68 ; JTG2.101 26.77,93.81 ; JTG2.101 27.06,92.94 ; JTG2.101 29.08,93.81 ; JTG2.101 28.79,92.94 ; JTG2.101 27.93,92.66 ; JTG3.62 27.93,150.09 ; JTG3.62 27.93,147.78 ; JTG3.62 27.06,148.07 ; JTG3.62 28.79,149.81 ; JTG3.62 28.79,148.07 ; JTG3.62 29.08,148.94 ; JTG3.62 27.06,149.81 ; JTG3.62 26.77,148.94 ; 27.06,122.89 JTG2.102 ; JTG2.102 26.77,123.76 ; JTG2.102 27.93,124.92 ; JTG2.102 27.93,122.61 ; JTG2.102 28.79,122.89 ; JTG2.102 28.79,124.63 ; JTG2.102 29.08,123.76 ; JTG2.102 27.06,124.63 ; JTG1.16 4.35,100.5 4.36,100.51 ; JTG3.61 29.08,128.99 ; JTG3.61 26.77,128.99 ; JTG3.61 27.06,128.12 ; JTG3.61 27.93,130.14 ; JTG3.61 28.79,128.12 ; JTG3.61 27.06,129.86 ; JTG3.61 27.93,127.83 ; JTG3.61 28.79,129.86
  TOP w0.457: 4.63,125.25 JTG1.49 ; 4.27,114 JTG1.34 ; JTG1.13 3.7,98.25 3.73,98.27 4.46,98.27 ; 5.15,141 JTG1.70 ; 4.3,96 JTG1.10 ; 4.35,109.5 JTG1.28 ; 4.63,102.75 JTG1.19 ; 5.31,145.5 JTG1.76 ; 5.15,118.5 JTG1.40 ; 4.34,107.25 JTG1.25 ; 4.63,143.25 JTG1.73 ; 4.35,123 JTG1.46 ; 5.15,132 JTG1.58 ; 4.46,138.75 JTG1.67 ; 4.63,89.25 JTG1.1 ; 4.63,147.75 JTG1.79 ; 4.63,120.75 JTG1.43 ; 4.43,105 JTG1.22 ; 4.46,111.75 JTG1.31 ; 5.31,150 JTG1.82 ; 4.79,152.25 JTG1.85 ; 5.15,136.5 JTG1.64 ; 4.46,134.25 JTG1.61 ; 4.63,129.75 JTG1.55 ; 4.33,93.75 JTG1.7 ; 5.31,127.5 JTG1.52 ; 4.29,116.25 JTG1.37
  02_GND w0.381: JTG3.62 29.08,148.94 ; JTG3.62 27.06,148.07 ; JTG3.62 27.93,150.09 ; JTG3.62 27.06,149.81 ; JTG3.62 26.77,148.94 ; JTG3.62 28.79,148.07 ; JTG3.62 28.79,149.81 ; JTG3.62 27.93,147.78 ; JTG2.102 29.08,123.76 ; JTG2.102 28.79,124.63 ; JTG2.102 27.93,124.92 ; JTG2.102 28.79,122.89 ; JTG2.102 26.77,123.76 ; JTG2.102 27.06,122.89 ; JTG2.102 27.93,122.61 ; JTG2.102 27.06,124.63 ; 26.77,128.99 JTG3.61 ; JTG3.61 27.06,128.12 ; JTG3.61 27.93,130.14 ; JTG3.61 28.79,128.12 ; JTG3.61 28.79,129.86 ; JTG3.61 29.08,128.99 ; JTG3.61 27.93,127.83 ; JTG3.61 27.06,129.86 ; 26.77,93.81 JTG2.101 ; JTG2.101 27.06,94.68 ; JTG2.101 27.93,94.97 ; JTG2.101 27.06,92.94 ; JTG2.101 27.93,92.66 ; JTG2.101 29.08,93.81 ; JTG2.101 28.79,94.68 ; JTG2.101 28.79,92.94
  04_GND w0.381: JTG2.102 28.79,124.63 ; JTG2.102 27.06,122.89 ; JTG2.102 27.93,122.61 ; JTG2.102 26.77,123.76 ; JTG2.102 27.93,124.92 ; JTG2.102 28.79,122.89 ; JTG2.102 27.06,124.63 ; JTG2.102 29.08,123.76 ; JTG3.61 28.79,128.12 ; JTG3.61 27.93,130.14 ; JTG3.61 27.06,128.12 ; JTG3.61 29.08,128.99 ; JTG3.61 27.93,127.83 ; JTG3.61 27.06,129.86 ; JTG3.61 28.79,129.86 ; JTG3.61 26.77,128.99 ; JTG2.101 27.93,94.97 ; JTG2.101 26.77,93.81 ; JTG2.101 29.08,93.81 ; JTG2.101 27.93,92.66 ; JTG2.101 28.79,94.68 ; JTG2.101 28.79,92.94 ; JTG2.101 27.06,94.68 ; JTG2.101 27.06,92.94 ; 27.93,147.78 JTG3.62 ; JTG3.62 28.79,148.07 ; JTG3.62 28.79,149.81 ; JTG3.62 27.06,148.07 ; JTG3.62 27.93,150.09 ; JTG3.62 27.06,149.81 ; JTG3.62 26.77,148.94 ; JTG3.62 29.08,148.94
  05_PWR1 w0.381: JTG2.102 29.08,123.76 ; JTG2.102 27.93,124.92 ; JTG2.102 26.77,123.76 ; JTG2.102 27.06,124.63 ; JTG2.102 28.79,122.89 ; JTG2.102 27.93,122.61 ; JTG2.102 28.79,124.63 ; JTG2.102 27.06,122.89 ; 27.06,92.94 JTG2.101 ; JTG2.101 28.79,92.94 ; JTG2.101 29.08,93.81 ; JTG2.101 27.06,94.68 ; JTG2.101 27.93,92.66 ; JTG2.101 28.79,94.68 ; JTG2.101 27.93,94.97 ; JTG2.101 26.77,93.81 ; JTG3.62 28.79,148.07 ; JTG3.62 27.06,149.81 ; JTG3.62 27.93,150.09 ; JTG3.62 29.08,148.94 ; JTG3.62 27.93,147.78 ; JTG3.62 27.06,148.07 ; JTG3.62 28.79,149.81 ; JTG3.62 26.77,148.94 ; JTG3.61 27.93,130.14 ; JTG3.61 26.77,128.99 ; JTG3.61 28.79,128.12 ; JTG3.61 29.08,128.99 ; JTG3.61 28.79,129.86 ; JTG3.61 27.06,128.12 ; JTG3.61 27.06,129.86 ; JTG3.61 27.93,127.83
  06_GND w0.381: JTG3.61 29.08,128.99 ; JTG3.61 28.79,129.86 ; JTG3.61 27.06,129.86 ; JTG3.61 26.77,128.99 ; JTG3.61 27.93,130.14 ; JTG3.61 27.93,127.83 ; JTG3.61 27.06,128.12 ; JTG3.61 28.79,128.12 ; JTG2.101 28.79,92.94 ; JTG2.101 27.06,94.68 ; JTG2.101 27.93,94.97 ; JTG2.101 27.93,92.66 ; JTG2.101 26.77,93.81 ; JTG2.101 29.08,93.81 ; JTG2.101 28.79,94.68 ; JTG2.101 27.06,92.94 ; 27.93,122.61 JTG2.102 ; JTG2.102 29.08,123.76 ; JTG2.102 27.06,122.89 ; JTG2.102 28.79,122.89 ; JTG2.102 27.93,124.92 ; JTG2.102 26.77,123.76 ; JTG2.102 28.79,124.63 ; JTG2.102 27.06,124.63 ; JTG3.62 29.08,148.94 ; JTG3.62 27.93,147.78 ; JTG3.62 28.79,149.81 ; JTG3.62 27.06,148.07 ; JTG3.62 27.93,150.09 ; JTG3.62 26.77,148.94 ; JTG3.62 28.79,148.07 ; JTG3.62 27.06,149.81
  08_GND w0.381: 27.93,122.61 JTG2.102 ; JTG2.102 29.08,123.76 ; JTG2.102 27.93,124.92 ; JTG2.102 28.79,124.63 ; JTG2.102 27.06,124.63 ; JTG2.102 27.06,122.89 ; JTG2.102 26.77,123.76 ; JTG2.102 28.79,122.89 ; 27.06,129.86 JTG3.61 ; JTG3.61 28.79,128.12 ; JTG3.61 29.08,128.99 ; JTG3.61 28.79,129.86 ; JTG3.61 26.77,128.99 ; JTG3.61 27.93,127.83 ; JTG3.61 27.06,128.12 ; JTG3.61 27.93,130.14 ; JTG3.62 28.79,149.81 ; JTG3.62 29.08,148.94 ; JTG3.62 27.93,147.78 ; JTG3.62 28.79,148.07 ; JTG3.62 27.93,150.09 ; JTG3.62 26.77,148.94 ; JTG3.62 27.06,148.07 ; JTG3.62 27.06,149.81 ; JTG2.101 28.79,92.94 ; JTG2.101 26.77,93.81 ; JTG2.101 27.06,94.68 ; JTG2.101 28.79,94.68 ; JTG2.101 27.93,94.97 ; JTG2.101 27.93,92.66 ; JTG2.101 29.08,93.81 ; JTG2.101 27.06,92.94
  09_SIG3 w0.381: JTG3.61 29.08,128.99 ; JTG3.61 27.06,129.86 ; JTG3.61 26.77,128.99 ; JTG3.61 27.06,128.12 ; JTG3.61 27.93,127.83 ; JTG3.61 28.79,129.86 ; JTG3.61 27.93,130.14 ; JTG3.61 28.79,128.12 ; JTG3.62 27.93,150.09 ; JTG3.62 28.79,149.81 ; JTG3.62 28.79,148.07 ; JTG3.62 29.08,148.94 ; JTG3.62 27.06,148.07 ; JTG3.62 27.93,147.78 ; JTG3.62 26.77,148.94 ; JTG3.62 27.06,149.81 ; JTG2.101 28.79,94.68 ; JTG2.101 29.08,93.81 ; JTG2.101 26.77,93.81 ; JTG2.101 27.93,92.66 ; JTG2.101 28.79,92.94 ; JTG2.101 27.06,92.94 ; JTG2.101 27.06,94.68 ; JTG2.101 27.93,94.97 ; JTG2.102 29.08,123.76 ; JTG2.102 27.06,124.63 ; JTG2.102 27.93,122.61 ; JTG2.102 27.06,122.89 ; JTG2.102 28.79,122.89 ; JTG2.102 27.93,124.92 ; JTG2.102 28.79,124.63 ; JTG2.102 26.77,123.76
  BOTTOM w0.254: JTG1.167 4.38,91.5 4.4,91.48 ; JTG1.1 4.63,89.25
  BOTTOM w0.381: 4.34,107.25 JTG1.25 ; 5.31,150 JTG1.82 ; 27.93,92.66 JTG2.101 ; JTG2.101 29.08,93.81 ; JTG2.101 27.93,94.97 ; JTG2.101 28.79,92.94 ; JTG2.101 27.06,94.68 ; JTG2.101 26.77,93.81 ; JTG2.101 28.79,94.68 ; JTG2.101 27.06,92.94 ; 4.46,98.27 2.28,98.27 JTG1.13 ; 27.06,149.81 JTG3.62 ; JTG3.62 28.79,149.81 ; JTG3.62 27.06,148.07 ; JTG3.62 29.08,148.94 ; JTG3.62 27.93,150.09 ; JTG3.62 27.93,147.78 ; JTG3.62 26.77,148.94 ; JTG3.62 28.79,148.07 ; 4.63,102.75 JTG1.19 ; 27.06,122.89 JTG2.102 ; JTG2.102 28.79,122.89 ; JTG2.102 28.79,124.63 ; JTG2.102 29.08,123.76 ; JTG2.102 26.77,123.76 ; JTG2.102 27.93,124.92 ; JTG2.102 27.06,124.63 ; JTG2.102 27.93,122.61 ; 5.15,136.5 JTG1.64 ; 27.06,128.12 JTG3.61 ; JTG3.61 27.06,129.86 ; JTG3.61 29.08,128.99 ; JTG3.61 28.79,128.12 ; JTG3.61 27.93,130.14 ; JTG3.61 26.77,128.99 ; JTG3.61 28.79,129.86 ; JTG3.61 27.93,127.83 ; JTG1.16 4.35,100.5 4.36,100.51 ; 4.46,111.75 JTG1.31 ; 4.63,143.25 JTG1.73 ; 5.15,132 JTG1.58 ; 4.46,134.25 JTG1.61 ; 4.35,109.5 JTG1.28 ; 4.63,120.75 JTG1.43 ; 4.27,114 JTG1.34 ; 4.3,96 JTG1.10 ; 4.79,152.25 JTG1.85 ; 4.63,125.25 JTG1.49 ; 5.15,141 JTG1.70 ; 4.63,129.75 JTG1.55 ; 4.33,93.75 JTG1.7 ; 5.31,145.5 JTG1.76 ; 5.31,127.5 JTG1.52 ; 4.29,116.25 JTG1.37 ; 5.15,118.5 JTG1.40 ; 4.35,123 JTG1.46 ; 4.46,138.75 JTG1.67 ; 4.43,105 JTG1.22
  BOTTOM w0.457: 4.63,147.75 JTG1.79
BP.DATA_IN_N<0>: length 32.1
  TOP w0.127: JTG1.53 4.04,128.25 4.3,128.5 19.38,128.5 21.98,125.9 21.98,121.18 23.03,120.13 26.45,120.13 v1(26.76,119.81)
  BOTTOM w0.127: v1(26.76,119.81) 26.42,120.16 26.01,120.16 25.89,120.04 JTG2.5
BP.DATA_IN_N<1>: length 33.4
  TOP w0.127: v1(12.23,125.82) 12.23,125.89 11.96,126.17 10.87,126.17 10.13,126.91 6.97,126.91 6.27,126.21 4.25,126.21 4.04,126 JTG1.50
  03_SIG1 w0.127: v1(12.23,125.82) 12.57,126.15 14.57,126.15 22.28,118.44 28.01,118.44 28.71,119.14 29.86,119.14 v1(30.19,118.81)
  BOTTOM w0.127: v1(30.19,118.81) 29.87,119.13 29.69,119.13 29.59,119.04 JTG2.10
BP.DATA_IN_N<2>: length 27.8
  TOP w0.127: JTG1.47 4.04,123.75 4.25,123.96 5.36,123.96 5.72,124.32 18.55,124.32 v1(18.96,123.92)
  BOTTOM w0.127: v1(18.96,123.92) 19.28,124.23 20.36,124.23 20.64,123.95 20.64,118.89 21.4,118.12 23.88,118.12 23.96,118.04 JTG2.13
BP.DATA_IN_N<3>: length 34
  TOP w0.127: JTG1.44 4.04,121.5 4.25,121.71 4.95,121.71 5.37,122.13 5.37,122.71 5.82,123.16 12.96,123.16 14.52,121.61 17.78,121.61 21.67,117.72 27.38,117.72 27.95,117.14 30.59,117.14 v1(30.96,116.78)
  BOTTOM w0.127: v1(30.96,116.78) 30.59,117.14 29.7,117.14 29.59,117.04 JTG2.18
BP.DATA_IN_N<4>: length 28.4
  TOP w0.127: JTG1.41 3.84,119.25 4.08,119.48 18.14,119.48 18.88,118.75 18.88,116.94 19.69,116.13 26.39,116.13 v1(26.73,115.79)
  BOTTOM w0.127: v1(26.73,115.79) 26.39,116.12 25.98,116.12 25.89,116.04 JTG2.21
BP.DATA_IN_N<5>: length 30.3
  TOP w0.127: v1(30.29,114.82) 29.99,115.12 28.05,115.12 27.72,114.8 26.06,114.8 25.75,115.11 8.43,115.11 6.33,117.21 4.25,117.21 4.04,117 JTG1.38
  BOTTOM w0.127: v1(30.29,114.82) 29.97,115.14 29.7,115.14 29.59,115.04 JTG2.26
BP.DATA_IN_N<6>: length 34.4
  BOTTOM w0.127: JTG1.118 4.07,128.25 4.26,128.44 14.02,128.44 16.53,125.93 16.53,115.61 18.78,113.36 21.65,113.36 22.41,114.12 23.88,114.12 23.96,114.04 JTG2.29
BP.DATA_IN_N<7>: length 44.2
  TOP w0.127: v1(10.3,113.93) 10.63,113.59 10.63,112.69 11.02,112.3 12.54,112.3 13.39,113.14 30.7,113.14 v1(30.99,112.85)
  07_SIG2 w0.127: v1(10.3,113.93) 10.64,114.27 10.64,121.88 v1(10.3,122.22)
  BOTTOM w0.127: v1(10.3,122.22) 10.59,122.51 10.59,124.86 9.3,126.15 4.17,126.15 4.01,126 JTG1.121 ; JTG2.34 29.59,113.04 29.7,113.14 30.7,113.14 v1(30.99,112.85)
BP.DATA_IN_N<8>: length 26.8
  BOTTOM w0.127: JTG2.37 23.96,112.04 23.88,112.12 18.05,112.12 6.21,123.96 4.23,123.96 4.02,123.75 JTG1.124
BP.DATA_IN_N<9>: length 33.5
  03_SIG1 w0.127: v1(30.16,110.85) 29.87,111.14 18.6,111.14 8.04,121.7 6.75,121.7 v1(6.42,121.36)
  BOTTOM w0.127: JTG2.42 29.23,111.04 29.31,111.12 29.49,111.12 29.51,111.15 29.52,111.15 29.52,111.14 29.87,111.14 v1(30.16,110.85) ; JTG1.127 4.02,121.5 4.21,121.69 5.99,121.69 6.32,121.36 v1(6.42,121.36)
BP.DATA_IN_N<10>: length 25.7
  BOTTOM w0.127: JTG2.45 23.96,110.04 23.88,110.12 17.4,110.12 8.06,119.45 5.83,119.45 5.83,119.46 4.23,119.46 4.02,119.25 JTG1.130
BP.DATA_IN_N<11>: length 34
  03_SIG1 w0.127: v1(30.9,108.82) 30.57,109.14 18.09,109.14 10.14,117.09 8.71,117.09 v1(8.43,116.81)
  BOTTOM w0.127: v1(30.9,108.82) 30.58,109.14 29.7,109.14 29.59,109.04 JTG2.50 ; v1(8.43,116.81) 8.43,116.84 8.06,117.21 4.23,117.21 4.02,117 JTG1.133
BP.DATA_IN_P<0>: length 32
  TOP w0.127: v1(26.76,120.78) 26.45,120.46 23.17,120.46 22.31,121.32 22.31,126.03 19.51,128.83 4.21,128.83 4.04,129 JTG1.54
  BOTTOM w0.127: v1(26.76,120.78) 26.47,120.49 25.94,120.49 25.89,120.54 JTG2.3
BP.DATA_IN_P<1>: length 33.3
  TOP w0.127: v1(12.23,126.82) 12.23,126.77 11.96,126.5 11.01,126.5 10.27,127.24 6.83,127.24 6.13,126.54 4.25,126.54 4.04,126.75 JTG1.51
  03_SIG1 w0.127: v1(12.23,126.82) 12.57,126.48 14.7,126.48 22.42,118.77 27.87,118.77 28.57,119.47 29.86,119.47 v1(30.19,119.81)
  BOTTOM w0.127: JTG2.8 29.59,119.54 29.67,119.46 29.85,119.46 v1(30.19,119.81)
BP.DATA_IN_P<2>: length 27.7
  TOP w0.127: JTG1.48 4.04,124.5 4.25,124.29 5.22,124.29 5.59,124.65 18.74,124.65 v1(18.96,124.88)
  BOTTOM w0.127: JTG2.11 23.96,118.54 23.88,118.45 21.54,118.45 20.97,119.02 20.97,124.09 20.5,124.56 19.28,124.56 v1(18.96,124.88)
BP.DATA_IN_P<3>: length 33.9
  TOP w0.127: JTG1.45 4.04,122.25 4.25,122.04 4.81,122.04 5.04,122.27 5.04,122.85 5.69,123.49 13.09,123.49 13.37,123.22 13.37,123.22 14.65,121.94 17.92,121.94 21.8,118.05 27.51,118.05 28.09,117.47 30.69,117.47 v1(30.96,117.74)
  BOTTOM w0.127: v1(30.96,117.74) 30.69,117.47 29.66,117.47 29.59,117.54 JTG2.16
BP.DATA_IN_P<4>: length 29.1
  TOP w0.127: v1(26.73,116.79) 26.39,116.46 19.82,116.46 19.21,117.07 19.21,118.89 18.28,119.81 4.01,119.81 3.82,120 JTG1.42
  BOTTOM w0.127: JTG2.19 25.89,116.54 25.98,116.45 26.39,116.45 v1(26.73,116.79)
BP.DATA_IN_P<5>: length 30.3
  TOP w0.127: JTG1.39 4.04,117.75 4.25,117.54 6.47,117.54 8.57,115.44 25.89,115.44 26.2,115.13 27.58,115.13 27.91,115.45 29.92,115.45 v1(30.29,115.82)
  BOTTOM w0.127: JTG2.24 29.59,115.54 29.66,115.47 29.94,115.47 v1(30.29,115.82)
BP.DATA_IN_P<6>: length 34.5
  BOTTOM w0.127: JTG2.27 23.96,114.54 23.88,114.45 22.27,114.45 21.51,113.69 18.92,113.69 16.86,115.75 16.86,126.06 14.16,128.77 4.32,128.77 4.09,129 JTG1.117
BP.DATA_IN_P<7>: length 44.3
  TOP w0.127: v1(30.99,113.82) 30.64,113.47 13.25,113.47 12.4,112.63 11.16,112.63 10.96,112.82 10.96,113.63 v1(11.26,113.93)
  07_SIG2 w0.127: v1(11.27,122.22) 10.97,121.93 10.97,114.22 v1(11.26,113.93)
  BOTTOM w0.127: JTG2.32 29.59,113.54 29.66,113.47 30.64,113.47 v1(30.99,113.82) ; v1(11.27,122.22) 10.92,122.58 10.92,125 9.43,126.48 4.26,126.48 4,126.75 JTG1.120
BP.DATA_IN_P<8>: length 26.8
  BOTTOM w0.127: JTG1.123 4.02,124.5 4.23,124.29 6.35,124.29 18.18,112.45 23.88,112.45 23.96,112.54 JTG2.35
BP.DATA_IN_P<9>: length 33.6
  03_SIG1 w0.127: v1(6.42,122.37) 6.75,122.03 8.18,122.03 18.73,111.47 29.78,111.47 v1(30.16,111.85)
  BOTTOM w0.127: v1(6.42,122.37) 6.42,122.3 6.13,122.02 6.13,122.02 4.24,122.02 4.02,122.25 JTG1.126 ; JTG2.40 29.59,111.54 29.66,111.47 29.78,111.47 v1(30.16,111.85)
BP.DATA_IN_P<10>: length 25.7
  BOTTOM w0.127: JTG1.129 4.02,120 4.23,119.79 6.16,119.79 6.17,119.79 8.2,119.79 17.53,110.45 23.88,110.45 23.96,110.54 JTG2.43
BP.DATA_IN_P<11>: length 33.9
  03_SIG1 w0.127: v1(8.43,117.78) 8.43,117.65 8.61,117.47 10.32,117.47 18.27,109.52 30.64,109.52 v1(30.9,109.78)
  BOTTOM w0.127: JTG1.132 4.02,117.75 4.23,117.54 8.19,117.54 v1(8.43,117.78) ; JTG2.48 29.57,109.54 29.63,109.47 30.59,109.47 v1(30.9,109.78)
BP.DATA_OUT_N<0>: length 24.6
  BOTTOM w0.127: JTG2.53 23.96,108.04 23.88,108.12 13.39,108.12 6.61,114.91 4.17,114.91 4.02,114.75 JTG1.136
BP.DATA_OUT_N<1>: length 31.7
  03_SIG1 w0.127: v1(30.29,106.86) 30.22,106.86 29.94,107.13 14.08,107.13 8.51,112.71 7.36,112.71 v1(7.02,112.37)
  BOTTOM w0.127: JTG1.139 4.02,112.5 4.23,112.71 6.68,112.71 v1(7.02,112.37) ; JTG2.58 29.37,107.04 29.44,107.11 29.96,107.11 30.22,106.86 v1(30.29,106.86)
BP.DATA_OUT_N<2>: length 23.6
  BOTTOM w0.127: JTG1.142 4.02,110.25 4.23,110.46 5.88,110.46 10.22,106.12 23.88,106.12 23.96,106.04 JTG2.61
BP.DATA_OUT_N<3>: length 32.3
  03_SIG1 w0.127: v1(6.33,107.94) 6.67,108.28 7.93,108.28 11.39,104.81 20.95,104.81 21.6,105.46 27.28,105.46 27.55,105.19 30.42,105.19 v1(30.8,104.82)
  BOTTOM w0.127: v1(30.8,104.82) 30.47,105.14 29.52,105.14 29.52,105.15 29.51,105.15 29.49,105.12 29.31,105.12 29.23,105.04 JTG2.66 ; JTG1.145 4.02,108 4.29,108.28 6,108.28 v1(6.33,107.94)
BP.DATA_OUT_N<4>: length 22.6
  BOTTOM w0.127: JTG1.148 4.02,105.75 4.23,105.96 4.36,105.97 6.41,105.97 8.25,104.12 23.88,104.12 23.96,104.04 JTG2.69
BP.DATA_OUT_N<5>: length 29.6
  03_SIG1 w0.127: v1(30.25,102.81) 29.87,103.18 24.02,103.18 23.52,103.68 6.84,103.68 v1(6.5,103.35)
  BOTTOM w0.127: JTG2.74 29.59,103.04 29.7,103.14 29.91,103.14 v1(30.25,102.81) ; v1(6.5,103.35) 6.5,103.36 6.15,103.71 4.23,103.71 4.02,103.5 JTG1.151
BP.DATA_OUT_N<6>: length 22.1
  BOTTOM w0.127: JTG2.77 23.96,102.04 23.88,102.12 18.54,102.12 17.97,101.55 4.32,101.55 4.02,101.25 JTG1.154
BP.DATA_OUT_N<7>: length 34.9
  03_SIG1 w0.127: v1(7.26,98.82) 6.92,99.16 6.92,100.33 8.12,101.53 20.94,101.53 21.43,102.03 27.44,102.03 28.33,101.13 30.52,101.13 v1(30.85,100.81)
  BOTTOM w0.127: v1(30.85,100.81) 30.51,101.14 29.52,101.14 29.52,101.15 29.51,101.15 29.49,101.12 29.31,101.12 29.23,101.04 JTG2.82 ; JTG1.157 4.27,99 4.4,99.2 4.61,99.25 4.64,99.25 5.23,98.66 5.23,98.19 5.59,97.83 6.54,97.83 6.89,98.17 6.89,98.65 7.06,98.82 v1(7.26,98.82)
BP.DATA_OUT_N<8>: length 23.6
  BOTTOM w0.127: JTG1.160 4.02,96.75 4.23,96.96 7.86,96.96 11.51,100.61 21.36,100.61 21.84,100.12 23.88,100.12 23.96,100.04 JTG2.85
BP.DATA_OUT_N<9>: length 31.2
  03_SIG1 w0.127: v1(6.35,94.37) 6.68,94.71 9.57,94.71 12.36,97.51 24.47,97.51 26.13,99.16 29.91,99.16 v1(30.26,98.81)
  BOTTOM w0.127: JTG1.163 4.02,94.5 4.23,94.71 6.01,94.71 v1(6.35,94.37) ; JTG2.90 29.59,99.04 29.7,99.14 29.93,99.14 v1(30.26,98.81)
BP.DATA_OUT_N<10>: length 24.4
  BOTTOM w0.127: JTG2.93 23.96,98.04 23.88,98.12 12.76,98.12 7.09,92.46 4.24,92.46 4.03,92.25 JTG1.166
BP.DATA_OUT_N<11>: length 36.4
  03_SIG1 w0.127: v1(30.79,96.82) 30.5,97.1 25.76,97.1 24.36,95.71 24.36,91.9 21.75,89.28 9.33,89.28 8.46,90.14 6.65,90.14 v1(6.43,89.92)
  BOTTOM w0.127: v1(6.43,89.92) 6.14,90.21 4.24,90.21 4.03,90 JTG1.169 ; JTG2.98 29.59,97.04 29.7,97.14 30.47,97.14 v1(30.79,96.82)
BP.DATA_OUT_P<0>: length 24.7
  BOTTOM w0.127: JTG1.135 4.02,115.5 4.28,115.24 6.75,115.24 13.53,108.45 23.88,108.45 23.96,108.54 JTG2.51
BP.DATA_OUT_P<1>: length 31.7
  03_SIG1 w0.127: v1(7.02,113.37) 7.36,113.04 8.65,113.04 14.17,107.51 30.04,107.51 v1(30.3,107.78)
  BOTTOM w0.127: JTG1.138 4.02,113.25 4.23,113.04 6.68,113.04 v1(7.02,113.37) ; JTG2.56 29.4,107.54 29.5,107.44 29.96,107.44 29.97,107.44 v1(30.3,107.78)
BP.DATA_OUT_P<2>: length 23.6
  BOTTOM w0.127: JTG1.141 4.02,111 4.23,110.79 6.02,110.79 10.35,106.45 23.88,106.45 23.96,106.54 JTG2.59
BP.DATA_OUT_P<3>: length 32.2
  03_SIG1 w0.127: v1(6.33,108.94) 6.67,108.61 8.06,108.61 11.53,105.14 20.82,105.14 21.46,105.79 27.42,105.79 27.68,105.52 30.5,105.52 v1(30.8,105.82)
  BOTTOM w0.127: JTG1.144 4.02,108.75 4.16,108.61 6,108.61 v1(6.33,108.94) ; JTG2.64 29.59,105.54 29.66,105.47 30.44,105.47 v1(30.8,105.82)
BP.DATA_OUT_P<4>: length 22.6
  BOTTOM w0.127: JTG1.147 4.02,106.5 4.22,106.29 4.35,106.3 6.55,106.3 8.39,104.45 23.88,104.45 23.96,104.54 JTG2.67
BP.DATA_OUT_P<5>: length 29.5
  03_SIG1 w0.127: v1(6.5,104.35) 6.84,104.01 23.66,104.01 24.15,103.51 29.95,103.51 v1(30.25,103.81)
  BOTTOM w0.127: v1(6.5,104.35) 6.19,104.04 4.23,104.04 4.02,104.25 JTG1.150 ; JTG2.72 29.59,103.54 29.66,103.47 29.91,103.47 v1(30.25,103.81)
BP.DATA_OUT_P<6>: length 22
  BOTTOM w0.127: JTG2.75 23.96,102.54 23.88,102.45 18.4,102.45 17.83,101.88 4.14,101.88 4.02,102 JTG1.153
BP.DATA_OUT_P<7>: length 34.8
  03_SIG1 w0.127: v1(6.26,98.82) 6.59,99.16 6.59,100.47 7.99,101.86 20.8,101.86 21.3,102.36 27.57,102.36 28.47,101.46 30.5,101.46 v1(30.85,101.81)
  BOTTOM w0.127: v1(6.26,98.82) 6.34,98.82 6.55,98.6 6.55,98.31 6.4,98.16 5.73,98.16 5.56,98.33 5.56,98.79 4.78,99.58 4.57,99.58 4.32,99.52 4.12,99.64 4.02,99.75 JTG1.156 ; JTG2.80 29.59,101.54 29.66,101.47 30.51,101.47 v1(30.85,101.81)
BP.DATA_OUT_P<8>: length 23.6
  BOTTOM w0.127: JTG1.159 4.02,97.5 4.23,97.29 7.72,97.29 11.37,100.94 21.49,100.94 21.98,100.45 23.88,100.45 23.96,100.54 JTG2.83
BP.DATA_OUT_P<9>: length 31.2
  03_SIG1 w0.127: v1(30.26,99.81) 29.95,99.49 25.99,99.49 24.33,97.84 12.23,97.84 9.43,95.04 6.68,95.04 v1(6.35,95.37)
  BOTTOM w0.127: JTG1.162 4.02,95.25 4.23,95.04 6.01,95.04 v1(6.35,95.37) ; JTG2.88 29.59,99.54 29.66,99.47 29.93,99.47 v1(30.26,99.81)
BP.DATA_OUT_P<10>: length 24.4
  BOTTOM w0.127: JTG1.165 4.03,93 4.21,92.81 6.96,92.81 12.63,98.48 23.9,98.48 23.96,98.54 JTG2.91
BP.DATA_OUT_P<11>: length 36.5
  03_SIG1 w0.127: v1(6.43,90.89) 6.84,90.47 8.6,90.47 9.46,89.61 21.61,89.61 24.03,92.03 24.03,95.84 25.62,97.43 30.43,97.43 v1(30.79,97.79)
  BOTTOM w0.127: JTG1.168 4.03,90.75 4.24,90.54 6.09,90.54 6.43,90.87 v1(6.43,90.89) ; JTG2.96 29.59,97.54 29.66,97.47 30.47,97.47 v1(30.79,97.79)
BP.REF_CLK_N<0>: length 49.3
  TOP w0.127: JTG1.35 4.04,114.75 4.25,114.96 5.57,114.96 5.96,115.35 5.96,115.71 v1(6.27,116.03)
  07_SIG2 w0.127: v1(16.22,145.99) 15.9,146.3 13.8,146.3 8.03,140.54 8.03,119.26 5.96,117.19 5.96,116.34 v1(6.27,116.03)
  BOTTOM w0.127: JTG3.5 23.96,145.21 23.88,145.3 18.16,145.3 17.15,146.3 16.54,146.3 v1(16.22,145.99)
BP.REF_CLK_N<1>: length 59
  TOP w0.127: v1(6.11,114.13) 5.77,113.79 5.77,113.17 5.32,112.72 4.26,112.72 4.04,112.5 JTG1.32
  07_SIG2 w0.127: v1(30.7,143.96) 30.7,144.13 30.52,144.31 28.21,144.31 27.9,144.62 14.33,144.62 9.37,139.66 9.37,121.54 9.78,121.13 9.78,116.06 8.48,114.77 5.89,114.77 5.77,114.65 5.77,114.47 v1(6.11,114.13)
  BOTTOM w0.127: JTG3.10 29.59,144.21 29.68,144.3 30.36,144.3 v1(30.7,143.96)
BP.REF_CLK_N<2>: length 56.6
  TOP w0.127: JTG1.29 4.04,110.25 4.25,110.46 4.91,110.46 5.32,110.87 6.85,110.87 7.22,111.24 7.9,111.24 v1(8.22,110.92)
  07_SIG2 w0.127: v1(8.22,110.92) 8.54,111.24 9.28,111.24 10.11,112.07 12.76,112.07 13.67,112.98 13.67,141.76 15.47,143.57 24.58,143.57 24.85,143.3 26.36,143.3 v1(26.68,142.98)
  BOTTOM w0.127: JTG3.13 25.89,143.21 25.98,143.3 26.36,143.3 v1(26.68,142.98)
BP.REF_CLK_N<3>: length 62.2
  TOP w0.127: JTG1.26 4.01,108 4.24,108.22 5.05,108.22 5.44,108.62 5.44,109.12 6.09,109.77 7.25,109.77 7.75,109.27 9.17,109.27 9.7,109.8 v1(10.15,109.8)
  07_SIG2 w0.127: v1(10.15,109.8) 10.15,110.25 10.81,110.91 14.57,110.91 14.85,111.19 14.85,140.71 16.77,142.63 24.17,142.63 24.98,141.82 27.53,141.82 28,142.3 29.9,142.3 v1(30.21,141.99)
  BOTTOM w0.127: JTG3.18 29.59,142.21 29.68,142.3 29.9,142.3 v1(30.21,141.99)
BP.REF_CLK_N<4>: length 54.6
  TOP w0.127: JTG1.23 4.04,105.75 4.25,105.96 5.14,105.96 5.86,106.68 5.99,106.8 9.19,106.8 10.27,107.88 v1(10.72,107.88)
  07_SIG2 w0.127: v1(23.14,140.89) 22.83,141.21 21.67,141.21 21.16,141.72 18.01,141.72 16.11,139.82 16.11,110.39 15.42,109.7 12.09,109.7 10.72,108.33 v1(10.72,107.88)
  BOTTOM w0.127: JTG3.21 23.46,141.21 v1(23.14,140.89)
BP.REF_CLK_N<5>: length 65.8
  TOP w0.127: v1(8.72,105.44) 8.27,105.44 8.07,105.24 5.9,105.24 5.39,104.73 5.39,104.35 4.74,103.71 4.25,103.71 4.04,103.5 JTG1.20
  07_SIG2 w0.127: v1(8.72,105.44) 8.72,105.9 9.18,106.36 16.34,106.36 17.52,107.53 17.52,122.33 17.22,122.62 17.22,125.62 17.42,125.82 17.42,139.56 18.72,140.86 20.69,140.86 21.88,139.67 25.88,139.67 26.51,140.3 30.29,140.3 30.6,140 v1(30.78,140)
  BOTTOM w0.127: v1(30.78,140) 30.48,140.3 29.68,140.3 29.59,140.21 JTG3.26
BP.REF_CLK_N<6>: length 58.1
  TOP w0.127: JTG1.17 3.87,101.25 4.04,101.42 7.52,101.42 8.11,102.01 8.11,102.43 v1(8.45,102.77)
  07_SIG2 w0.127: v1(8.45,102.77) 8.11,103.1 8.11,103.28 8.61,103.78 15.59,103.78 18.61,106.8 18.61,123.39 18.16,123.85 18.16,125.37 18.61,125.83 18.61,138.81 19.04,139.23 19.7,139.23 19.94,139 v1(19.94,138.89)
  BOTTOM w0.127: v1(19.94,138.89) 20.26,139.21 JTG3.29
BP.REF_CLK_N<7>: length 67.2
  TOP w0.127: JTG1.14 4.04,99 4.25,99.21 4.83,99.21 5.44,99.81 5.44,100.25 5.74,100.55 8.63,100.55 8.82,100.37 8.82,100.15 v1(8.5,99.83)
  07_SIG2 w0.127: v1(8.5,99.83) 8.82,99.51 8.82,99.07 9.44,98.45 13.6,98.45 17.81,102.65 17.81,104.27 20.37,106.83 20.37,137.37 21.51,138.52 25.83,138.52 26.05,138.3 26.99,138.3 29.85,138.3 v1(30.19,137.96)
  BOTTOM w0.127: JTG3.34 29.59,138.21 29.68,138.3 29.85,138.3 v1(30.19,137.96)
BP.REF_CLK_N<8>: length 60.4
  TOP w0.127: v1(20.13,99.89) 19.79,99.55 19.79,99.15 19.28,98.63 9.3,98.63 7.98,97.31 5.56,97.31 5.21,96.96 4.25,96.96 4.04,96.75 JTG1.11
  07_SIG2 w0.127: v1(20.13,99.89) 19.8,100.22 19.8,104.69 21.26,106.15 21.26,136.82 21.79,137.35 22.09,137.35 22.41,137.03 v1(22.41,137.01)
  BOTTOM w0.127: v1(22.41,137.01) 22.73,137.33 23.85,137.33 23.96,137.21 JTG3.37
BP.REF_CLK_N<9>: length 70.3
  TOP w0.127: JTG1.8 3.72,94.5 3.9,94.67 5.07,94.67 5.48,95.08 5.48,95.91 5.88,96.3 8.67,96.3 10.13,97.76 21.19,97.76 21.66,98.23 21.66,99.03 v1(22,99.37)
  07_SIG2 w0.127: v1(30.77,135.93) 30.77,136.17 30.65,136.3 29.09,136.3 29.08,136.28 27.5,136.28 26.93,136.85 23.84,136.85 22.16,135.17 22.16,105.48 21.67,104.99 21.67,99.7 v1(22,99.37)
  BOTTOM w0.127: v1(30.77,135.93) 30.41,136.3 29.68,136.3 29.59,136.21 JTG3.42
BP.REF_CLK_N<10>: length 65.8
  TOP w0.127: v1(23.4,101.19) 23.03,100.82 23.03,97.28 22.55,96.79 10.44,96.79 6.61,92.97 5.6,92.97 5.09,92.46 4.26,92.46 4.05,92.25 JTG1.5
  07_SIG2 w0.127: v1(23.4,101.19) 23.03,101.56 23.03,134.38 23.98,135.32 26.44,135.32 26.78,134.98 v1(26.78,134.96)
  BOTTOM w0.127: v1(26.78,134.96) 26.45,135.3 25.98,135.3 25.89,135.21 JTG3.45
BP.REF_CLK_N<11>: length 73.6
  TOP w0.127: JTG1.2 3.87,90 4.05,90.18 4.84,90.18 5.34,90.68 5.34,91.31 5.9,91.87 7.14,91.87 7.63,91.39 7.63,89.92 8.51,89.03 12.58,89.03 15.25,91.69 15.25,92.84 17.58,95.17 22.17,95.17 v1(22.48,94.86)
  07_SIG2 w0.127: v1(22.48,94.86) 22.79,95.16 24.02,95.16 24.41,95.56 24.41,131.59 25.96,133.14 27.5,133.14 28.66,134.3 29.79,134.3 v1(30.11,133.98)
  BOTTOM w0.127: JTG3.50 29.59,134.21 29.64,134.26 29.82,134.26 v1(30.11,133.98)
BP.REF_CLK_P<0>: length 49.3
  TOP w0.127: JTG1.36 4.04,115.5 4.25,115.29 5.43,115.29 5.63,115.48 5.63,115.71 v1(5.31,116.03)
  07_SIG2 w0.127: v1(16.22,146.95) 15.9,146.63 13.65,146.63 7.7,140.69 7.7,119.39 5.63,117.32 5.63,116.34 v1(5.31,116.03)
  BOTTOM w0.127: JTG3.3 23.96,145.71 23.88,145.63 18.29,145.63 17.29,146.63 16.54,146.63 v1(16.22,146.95)
BP.REF_CLK_P<1>: length 59
  TOP w0.127: v1(5.1,114.13) 5.44,113.79 5.44,113.31 5.18,113.05 4.24,113.05 4.04,113.25 JTG1.33
  07_SIG2 w0.127: v1(5.1,114.13) 5.44,114.47 5.44,114.78 5.75,115.1 8.34,115.1 9.45,116.2 9.45,120.99 9.02,121.42 9.02,139.8 14.17,144.95 28.04,144.95 28.35,144.64 30.54,144.64 30.7,144.8 v1(30.7,144.96)
  BOTTOM w0.127: JTG3.8 29.59,144.71 29.68,144.63 30.36,144.63 v1(30.7,144.96)
BP.REF_CLK_P<2>: length 56.6
  TOP w0.127: JTG1.30 4.04,111 4.25,110.79 4.77,110.79 5.18,111.2 6.71,111.2 7.08,111.57 7.9,111.57 v1(8.22,111.89)
  07_SIG2 w0.127: v1(26.68,143.95) 26.36,143.63 24.98,143.63 24.72,143.9 15.33,143.9 13.34,141.9 13.34,113.11 12.62,112.4 9.98,112.4 9.14,111.57 8.54,111.57 v1(8.22,111.89)
  BOTTOM w0.127: JTG3.11 25.89,143.71 25.98,143.63 26.36,143.63 v1(26.68,143.95)
BP.REF_CLK_P<3>: length 63
  TOP w0.127: JTG1.27 4.05,108.75 4.24,108.56 4.91,108.56 5.11,108.75 5.11,109.26 5.95,110.11 7.38,110.11 7.89,109.6 9.03,109.6 9.47,110.04 v1(9.47,110.49)
  07_SIG2 w0.127: v1(9.47,110.49) 9.92,110.49 10.67,111.24 14.43,111.24 14.52,111.33 14.52,140.85 16.63,142.96 24.31,142.96 25.12,142.15 27.39,142.15 27.87,142.64 29.89,142.64 v1(30.21,142.95)
  BOTTOM w0.127: JTG3.16 29.59,142.71 29.68,142.63 29.89,142.63 v1(30.21,142.95)
BP.REF_CLK_P<4>: length 54.7
  TOP w0.127: v1(10.03,108.56) 10.03,108.11 9.87,107.95 9.06,107.13 5.85,107.13 5.01,106.29 4.25,106.29 4.04,106.5 JTG1.24
  07_SIG2 w0.127: v1(23.14,141.86) 22.83,141.54 21.8,141.54 21.29,142.05 17.87,142.05 15.77,139.96 15.77,110.52 15.28,110.03 11.95,110.03 10.48,108.56 v1(10.03,108.56)
  BOTTOM w0.127: JTG3.19 23.96,141.71 23.79,141.54 23.46,141.54 v1(23.14,141.86)
BP.REF_CLK_P<5>: length 65.8
  TOP w0.127: v1(8.04,106.13) 8.04,105.68 7.93,105.57 5.76,105.57 5.06,104.87 5.06,104.49 4.61,104.04 4.25,104.04 4.04,104.25 JTG1.21
  07_SIG2 w0.127: v1(8.04,106.13) 8.49,106.13 9.04,106.69 16.2,106.69 17.19,107.67 17.19,122.19 16.89,122.48 16.89,125.76 17.09,125.95 17.09,139.7 18.59,141.19 20.82,141.19 22.02,140 25.74,140 26.37,140.63 30.29,140.63 30.63,140.96 v1(30.78,140.96)
  BOTTOM w0.127: JTG3.24 29.59,140.71 29.68,140.63 30.45,140.63 v1(30.78,140.96)
BP.REF_CLK_P<6>: length 59
  TOP w0.127: v1(7.45,102.77) 7.78,102.43 7.78,102.15 7.38,101.75 4.04,101.75 3.79,102 JTG1.18
  07_SIG2 w0.127: v1(19.94,139.9) 19.94,139.8 19.7,139.56 18.9,139.56 18.28,138.94 18.28,125.96 17.83,125.51 17.83,123.71 18.28,123.25 18.28,106.94 15.45,104.11 8.47,104.11 7.78,103.42 7.78,103.1 v1(7.45,102.77)
  BOTTOM w0.127: JTG3.27 23.96,139.71 23.79,139.54 20.29,139.54 v1(19.94,139.9)
BP.REF_CLK_P<7>: length 67.2
  TOP w0.127: JTG1.15 4.04,99.75 4.25,99.54 4.69,99.54 5.1,99.95 5.1,100.39 5.6,100.88 8.84,100.88 9.15,100.58 9.15,100.15 v1(9.47,99.83)
  07_SIG2 w0.127: v1(30.19,138.93) 29.89,138.63 26.19,138.63 25.97,138.85 21.38,138.85 20.04,137.51 20.04,106.96 17.48,104.4 17.48,102.79 13.46,98.78 9.58,98.78 9.15,99.21 9.15,99.51 v1(9.47,99.83)
  BOTTOM w0.127: v1(30.19,138.93) 29.89,138.63 29.68,138.63 29.59,138.71 JTG3.32
BP.REF_CLK_P<8>: length 60.3
  TOP w0.127: v1(19.16,99.89) 19.46,99.59 19.46,99.28 19.14,98.96 9.16,98.96 7.84,97.64 5.42,97.64 5.07,97.29 4.25,97.29 4.04,97.5 JTG1.12
  07_SIG2 w0.127: v1(22.41,137.98) 22.12,137.68 21.65,137.68 20.93,136.95 20.93,106.28 19.47,104.83 19.47,100.2 v1(19.16,99.89)
  BOTTOM w0.127: JTG3.35 23.96,137.71 23.91,137.66 22.73,137.66 v1(22.41,137.98)
BP.REF_CLK_P<9>: length 71
  TOP w0.127: JTG1.9 3.65,95.25 3.9,95 4.94,95 5.15,95.22 5.15,96.04 5.74,96.63 8.54,96.63 10,98.09 21.01,98.09 21.33,98.41 21.33,99.03 v1(21,99.37)
  07_SIG2 w0.127: v1(30.77,136.93) 30.77,136.76 30.65,136.63 28.95,136.63 28.94,136.61 27.63,136.61 27.07,137.18 23.7,137.18 21.83,135.31 21.83,105.62 21.34,105.12 21.34,99.7 21.27,99.63 v1(21,99.37)
  BOTTOM w0.127: v1(30.77,136.93) 30.47,136.63 29.68,136.63 29.59,136.71 JTG3.40
BP.REF_CLK_P<10>: length 65.7
  TOP w0.127: JTG1.6 4.05,93 4.21,92.84 4.96,92.84 5.47,93.34 6.48,93.34 10.29,97.16 22.44,97.16 22.7,97.41 22.7,100.89 v1(22.4,101.19)
  07_SIG2 w0.127: v1(22.4,101.19) 22.7,101.49 22.7,134.51 23.84,135.65 26.47,135.65 v1(26.78,135.96)
  BOTTOM w0.127: JTG3.43 25.89,135.71 25.98,135.63 26.45,135.63 v1(26.78,135.96)
BP.REF_CLK_P<11>: length 72.4
  TOP w0.127: JTG1.3 3.81,90.75 4.01,90.55 4.7,90.55 4.96,90.81 4.96,91.44 5.72,92.2 7.3,92.2 7.96,91.54 7.96,90.09 8.64,89.41 12.48,89.41 14.92,91.85 14.92,92.97 17.45,95.5 22.16,95.5 v1(22.48,95.82)
  07_SIG2 w0.127: v1(30.11,134.95) 29.79,134.63 28.52,134.63 27.36,133.47 25.82,133.47 24.08,131.73 24.08,95.69 23.88,95.49 22.81,95.49 v1(22.48,95.82)
  BOTTOM w0.127: v1(30.11,134.95) 29.82,134.66 29.64,134.66 29.59,134.71 JTG3.48
Net_84: length 184.1
  05_PWR1 w0.203: 176.38,59.64 178.08,57.94 178.08,11.66 176.79,10.36 148.87,10.36 147.02,8.51 147.02,3.66 145.04,1.68 51.69,1.68 51.49,1.88 51.49,3.63
Net_101: length 95
  05_PWR1 w0.457: 88.12,44.86 87.1,43.84 83.09,43.84 82.48,44.45 82.48,44.68 81.31,45.85
  05_PWR1 w0.762: 82.23,55.35 82.21,55.37 79.74,55.37 78.57,54.2 78.57,48.52 79.74,47.35 81.65,47.35 81.65,46.18 81.31,45.85 80.17,45.85
  05_PWR1 w1.016: 123.65,14.99 123.63,15.01 123.63,18.95 121.77,20.8 119.23,20.8 112.17,27.86 112.17,37.31 106.3,43.18 104.17,43.18 103.61,43.74 98.15,43.74 95.92,45.97 92.46,45.97 89.21,42.72 80.52,42.72 79.69,43.56 76.84,43.56 ; 76.59,42.34 76.84,42.6 76.84,43.56 ; 76.76,43.48 76.84,43.56

## Copper pours and planes (outline as drawn; the poured copper is in the pictures)
GND on TOP: 0.63,152.38 0.87,152.61 9.8,152.61 10.96,153.09 11.44,154.25 11.44,155.17 32.03,155.17 32.03,86.33 11.44,86.33 11.44,87.26 10.95,88.41 9.8,88.88 0.86,88.88 0.63,89.11 ; 6 cut-outs
GND on BOTTOM, 02_GND, 04_GND, 05_PWR1, 06_GND, 08_GND, 09_SIG3: 0.63,152.38 0.87,152.61 9.8,152.61 10.96,153.09 11.44,154.25 11.44,155.17 32.03,155.17 32.03,86.33 11.44,86.33 11.44,87.26 10.95,88.41 9.8,88.88 0.86,88.88 0.63,89.11
GND on 02_GND, 04_GND, 06_GND, 08_GND: 157.37,0.64 11.44,0.64 11.44,3.26 10.95,4.41 9.8,4.89 0.86,4.89 0.64,5.11 0.64,68.39 0.87,68.62 9.8,68.62 10.96,69.1 11.44,70.25 11.44,72.87 166.37,72.87 166.37,71.87 173.97,71.87 173.97,67.66 179.97,67.66 179.97,1.73 166.88,1.73 166.88,2.23 157.37,2.23 ; 1 cut-out
(no net) on 02_GND: 96.81,48.55 96.81,52.08 96.63,52.25 93.13,52.25 91.88,51.01 91.12,51.01 91.12,49.26 92.39,49.26 93.28,48.37 96.63,48.37
(no net) on 05_PWR1: 8.36,35.64 8.36,18.59 9.25,17.7 20.93,17.7 21.62,18.39 21.62,34.87 20.5,35.99 8.72,35.99
(no net) on 05_PWR1: 8.44,53.34 18.9,53.34 19.69,54.25 19.69,60.83 19.28,61.24 8.21,61.24 8.21,59.89 8.46,59.64 8.46,59.31 8.44,59.28
(no net) on 05_PWR1: 8.51,48.79 8.51,41.15 19.89,41.15 20.33,41.76 20.33,48.64 19.92,49.05 8.77,49.05
(no net) on 05_PWR1: 123.55,47.52 123.04,47.02 123.04,39.4 123.8,38.63 130.92,38.63 131.17,38.89 131.17,44.48 131.68,44.98 133.3,44.98 133.58,45.26 133.58,47.29 133.36,47.52
(no net) on 05_PWR1: 90.99,56.96 84.98,56.96 82.86,54.84 81.59,54.84 80.96,54.2 80.96,45.31 82.73,43.54 88.58,43.54 89.62,44.58 89.62,50.52 90.92,51.83 92.3,51.83 92.83,52.36 92.83,53.35 91.6,54.58 91.6,56.35
(no net) on 05_PWR1: 122.56,65.68 122.08,65.2 122.08,57.63 122.92,56.79 129.52,56.79 130.21,57.48 130.21,62.64 130.71,63.14 132.21,63.14 132.62,63.55 132.62,65.38 132.31,65.68
Net_76 on 05_PWR1 (solid shape): 21.62,34.87 21.62,18.39 20.93,17.7 9.25,17.7 8.36,18.59 8.36,35.64 8.72,35.99 20.5,35.99
Net_78 on 05_PWR1: 11.46,2.69 11.46,4.09 10.9,4.65 5.77,4.65 5.77,4.67 3.08,4.67 3.08,68.63 7.7,68.63 7.7,18.21 9,16.92 21.67,16.92 22.97,18.21 22.97,25.6 23.68,26.31 44.68,26.31 45.37,25.63 45.37,2.46 45.01,2.11 12.04,2.11
Net_82 on 05_PWR1 (solid shape): 91.6,56.35 91.6,54.58 92.83,53.35 92.83,52.36 92.3,51.83 90.92,51.83 89.62,50.52 89.62,44.58 88.58,43.54 87.62,43.54 87.52,43.6 87.55,43.71 88.41,44.57 88.49,44.7 88.52,44.86 88.41,45.14 88.12,45.26 87.96,45.23 87.83,45.14 86.93,44.25 83.26,44.25 82.89,44.62 82.89,44.68 82.85,44.83 82.77,44.97 81.99,45.74 82.04,45.79 82.16,45.97 82.21,46.18 82.21,47.35 82.04,47.75 81.65,47.91 80.96,47.91 80.96,54.2 81.56,54.81 82.08,54.81 82.16,54.8 82.23,54.79 82.33,54.8 82.43,54.83 82.44,54.84 82.86,54.84 84.98,56.96 90.99,56.96
Net_84 on 05_PWR1: 46.97,25.93 46.97,2.49 47.38,2.08 103.99,2.08 105.21,3.3 105.21,8.97 104.6,9.58 64.01,9.58 55.96,17.63 55.96,25.93 55.63,26.29 47.33,26.29
Net_101 on 05_PWR1: 12.07,72.23 165.73,72.23 165.73,71.23 173.33,71.23 173.33,67.03 176.21,67.03 176.08,10.97 148.42,10.97 146.72,9.27 146.72,4.22 144.56,2.06 108.29,2.06 107.14,3.2 107.14,10.06 106.23,10.97 65.61,10.97 57.99,18.59 57.99,26.67 56.85,27.81 23.37,27.81 22.76,28.42 22.76,35.81 22.13,36.45 22.08,36.45 21.9,36.63 9.48,36.63 8.46,37.64 8.46,67.98 9.8,67.98 11.41,68.65 12.07,70.25 ; 4 cut-outs
Net_104 on 05_PWR1: 122.2,15.72 122.2,12.45 124.29,12.45 124.29,15.72
Net_106 on 05_PWR1 (solid shape): 132.62,65.38 132.62,63.55 132.21,63.14 130.71,63.14 130.21,62.64 130.21,57.48 129.52,56.79 122.92,56.79 122.08,57.63 122.08,65.2 122.56,65.68 132.31,65.68
Net_107 on 05_PWR1 (solid shape): 20.33,48.64 20.33,41.76 19.89,41.15 8.51,41.15 8.51,48.79 8.77,49.05 19.92,49.05
Net_108 on 05_PWR1 (solid shape): 19.69,60.83 19.69,54.25 18.9,53.34 8.44,53.34 8.44,59.28 8.46,59.31 8.46,59.64 8.21,59.89 8.21,61.24 19.28,61.24
Net_135 on 02_GND (solid shape): 96.81,52.08 96.81,48.55 96.63,48.37 93.28,48.37 92.39,49.26 91.12,49.26 91.12,51.01 91.88,51.01 93.13,52.25 96.63,52.25
Net_136 on 05_PWR1 (solid shape): 133.58,47.29 133.58,45.26 133.3,44.98 131.68,44.98 131.17,44.48 131.17,38.89 130.92,38.63 123.8,38.63 123.04,39.4 123.04,47.02 123.55,47.52 133.36,47.52

## Text on the board
Ref Des/Silkscreen Bottom: JUNE 19 2020 | G MAYERS | MIB
User.Comments: CR_MMC_V2_1 | CR_TPS7A85_3.3_4AMPS_1 | CR_SFP_V0_2 | CR_SFP_V0_3 | CR_SFP_V1_2 | CR_SFP_V1_1 | CR_SFP_V1_3 | CR_CDR_1_1 | CR_CLK_GEN_1 | CR_CLK_FO_1 | CR_TPS7A85_3V3_7AMPS_1
Ref Des/Silkscreen Top: DCDC_ENABLE | JUNE 19 2020 | G MAYERS | MIB | VCC3V3 | GND | VP3V5 | VP3V3 | UTIL ENABLE | 3 | 2 | 1 | VP1V8 | MICRO-TCA INTERFACE BOARD (MIB)
PAGE_OUTLINE: GODWIN M. MAYERS | 06/19/20 | TEL: 215-898-6809 | EMAIL: MAYERS@HEP.UPENN.EDU | CONTACT: GODWIN M. MAYERS | 209 SOUTH 33RD STREET | PHILADELPHIA PA 19104 | 1 | MICRO-TCA INTERFACE BOARD (MIB) | 06/21/20
